# Altium PCB SBH_MCU.PcbDoc (part 1 of 2)
Units mm, origin at the board's own origin, x right, y up, seen from the top; angles counter-clockwise.
Board outline 53.97 x 54.34 mm, 4 copper layers (Top Layer, Mid Layer 1, Mid Layer 2, Bottom Layer), stack 1.57 mm thick; 82 components, 76 nets, 307 pads, 113 vias.
Unrouted connection lines stored in the file: 14.
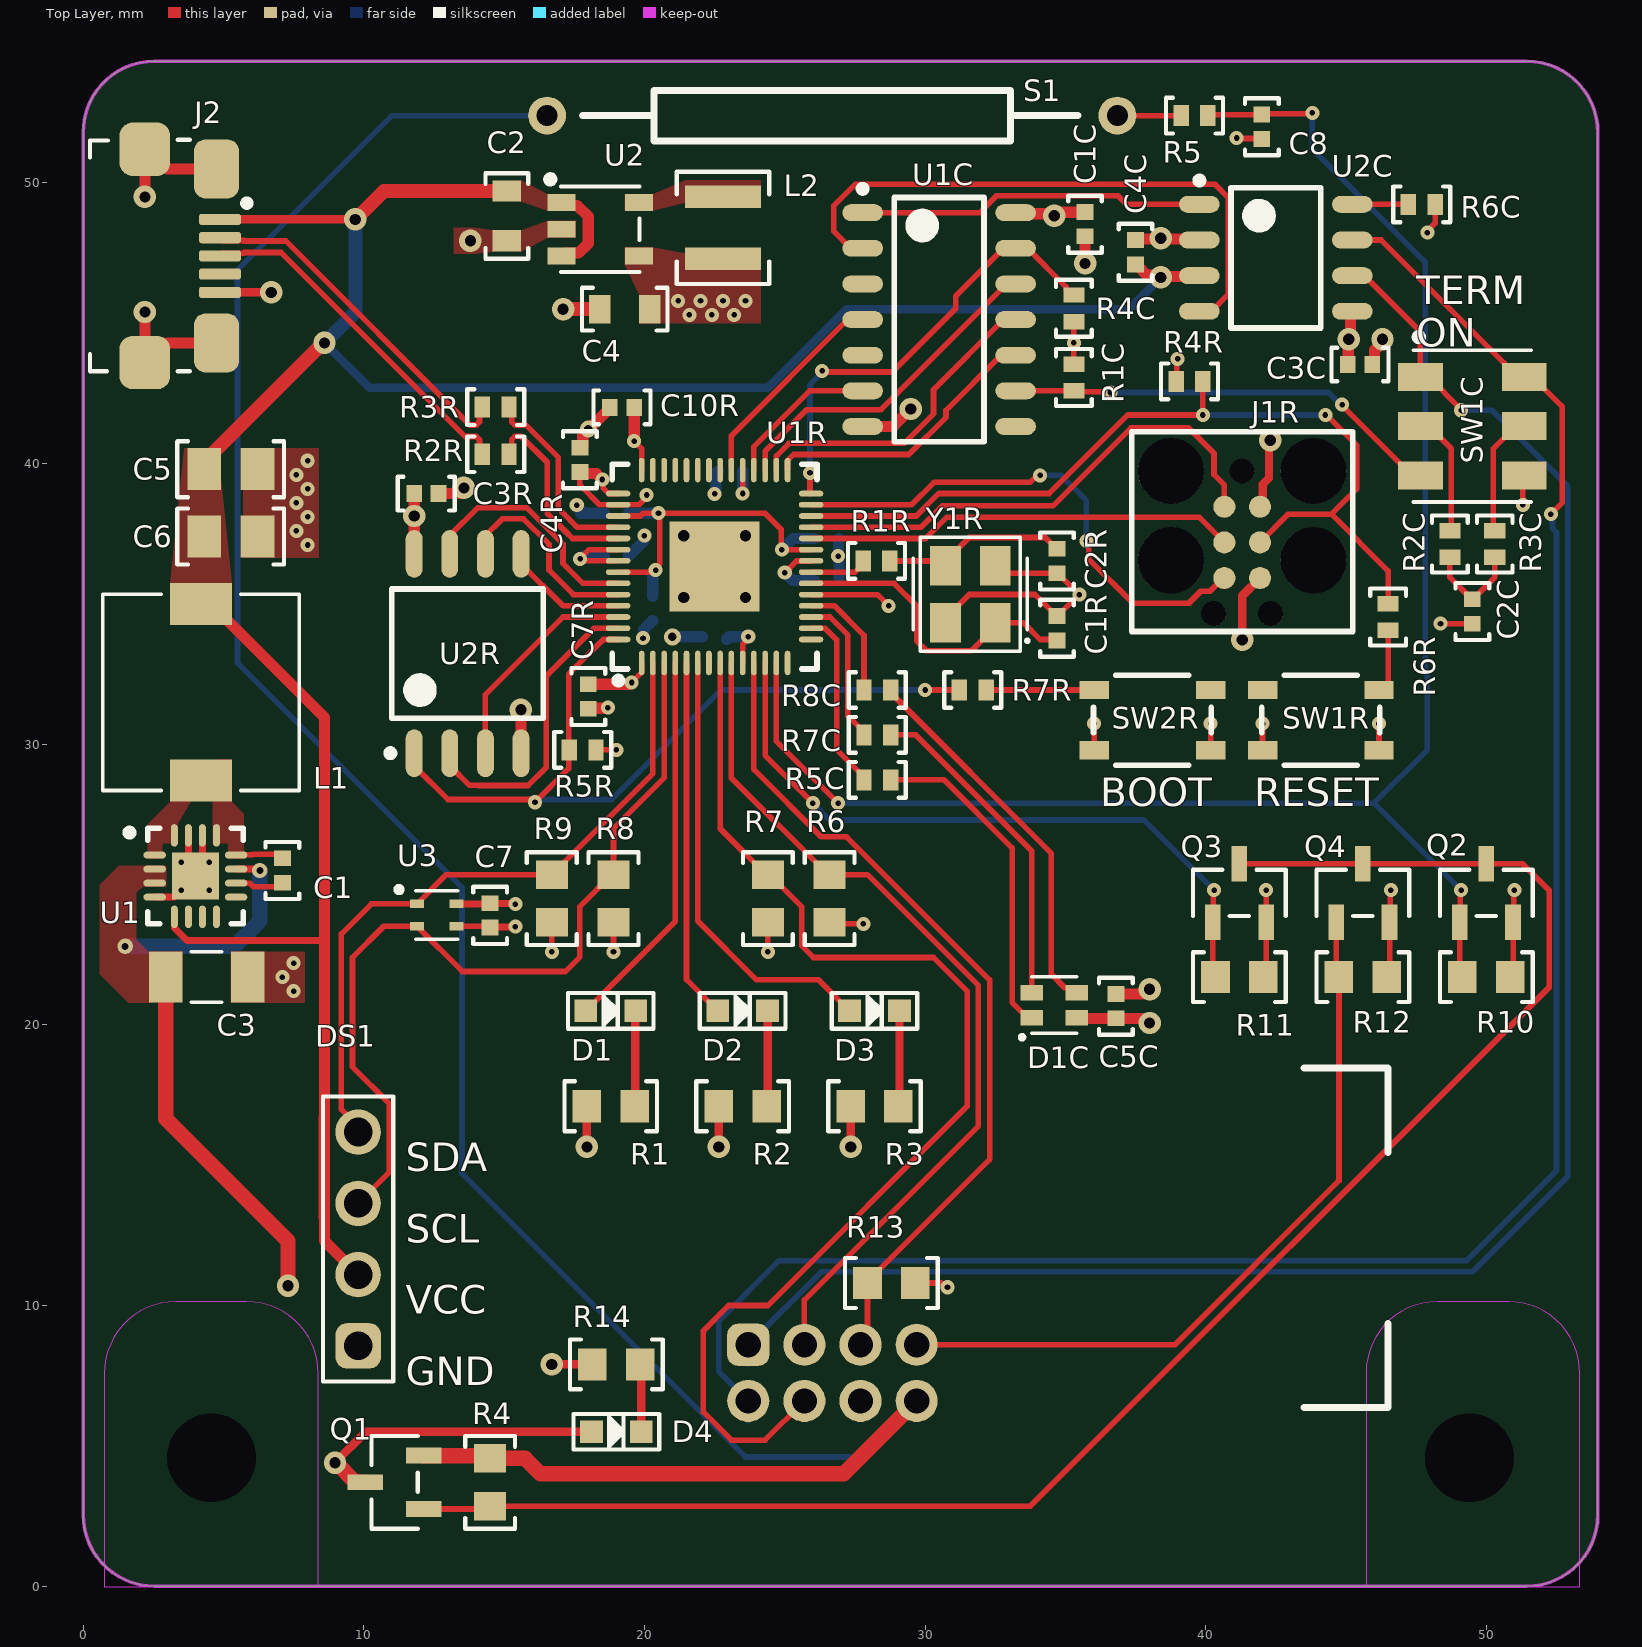
[diagram p0: Top Layer view]
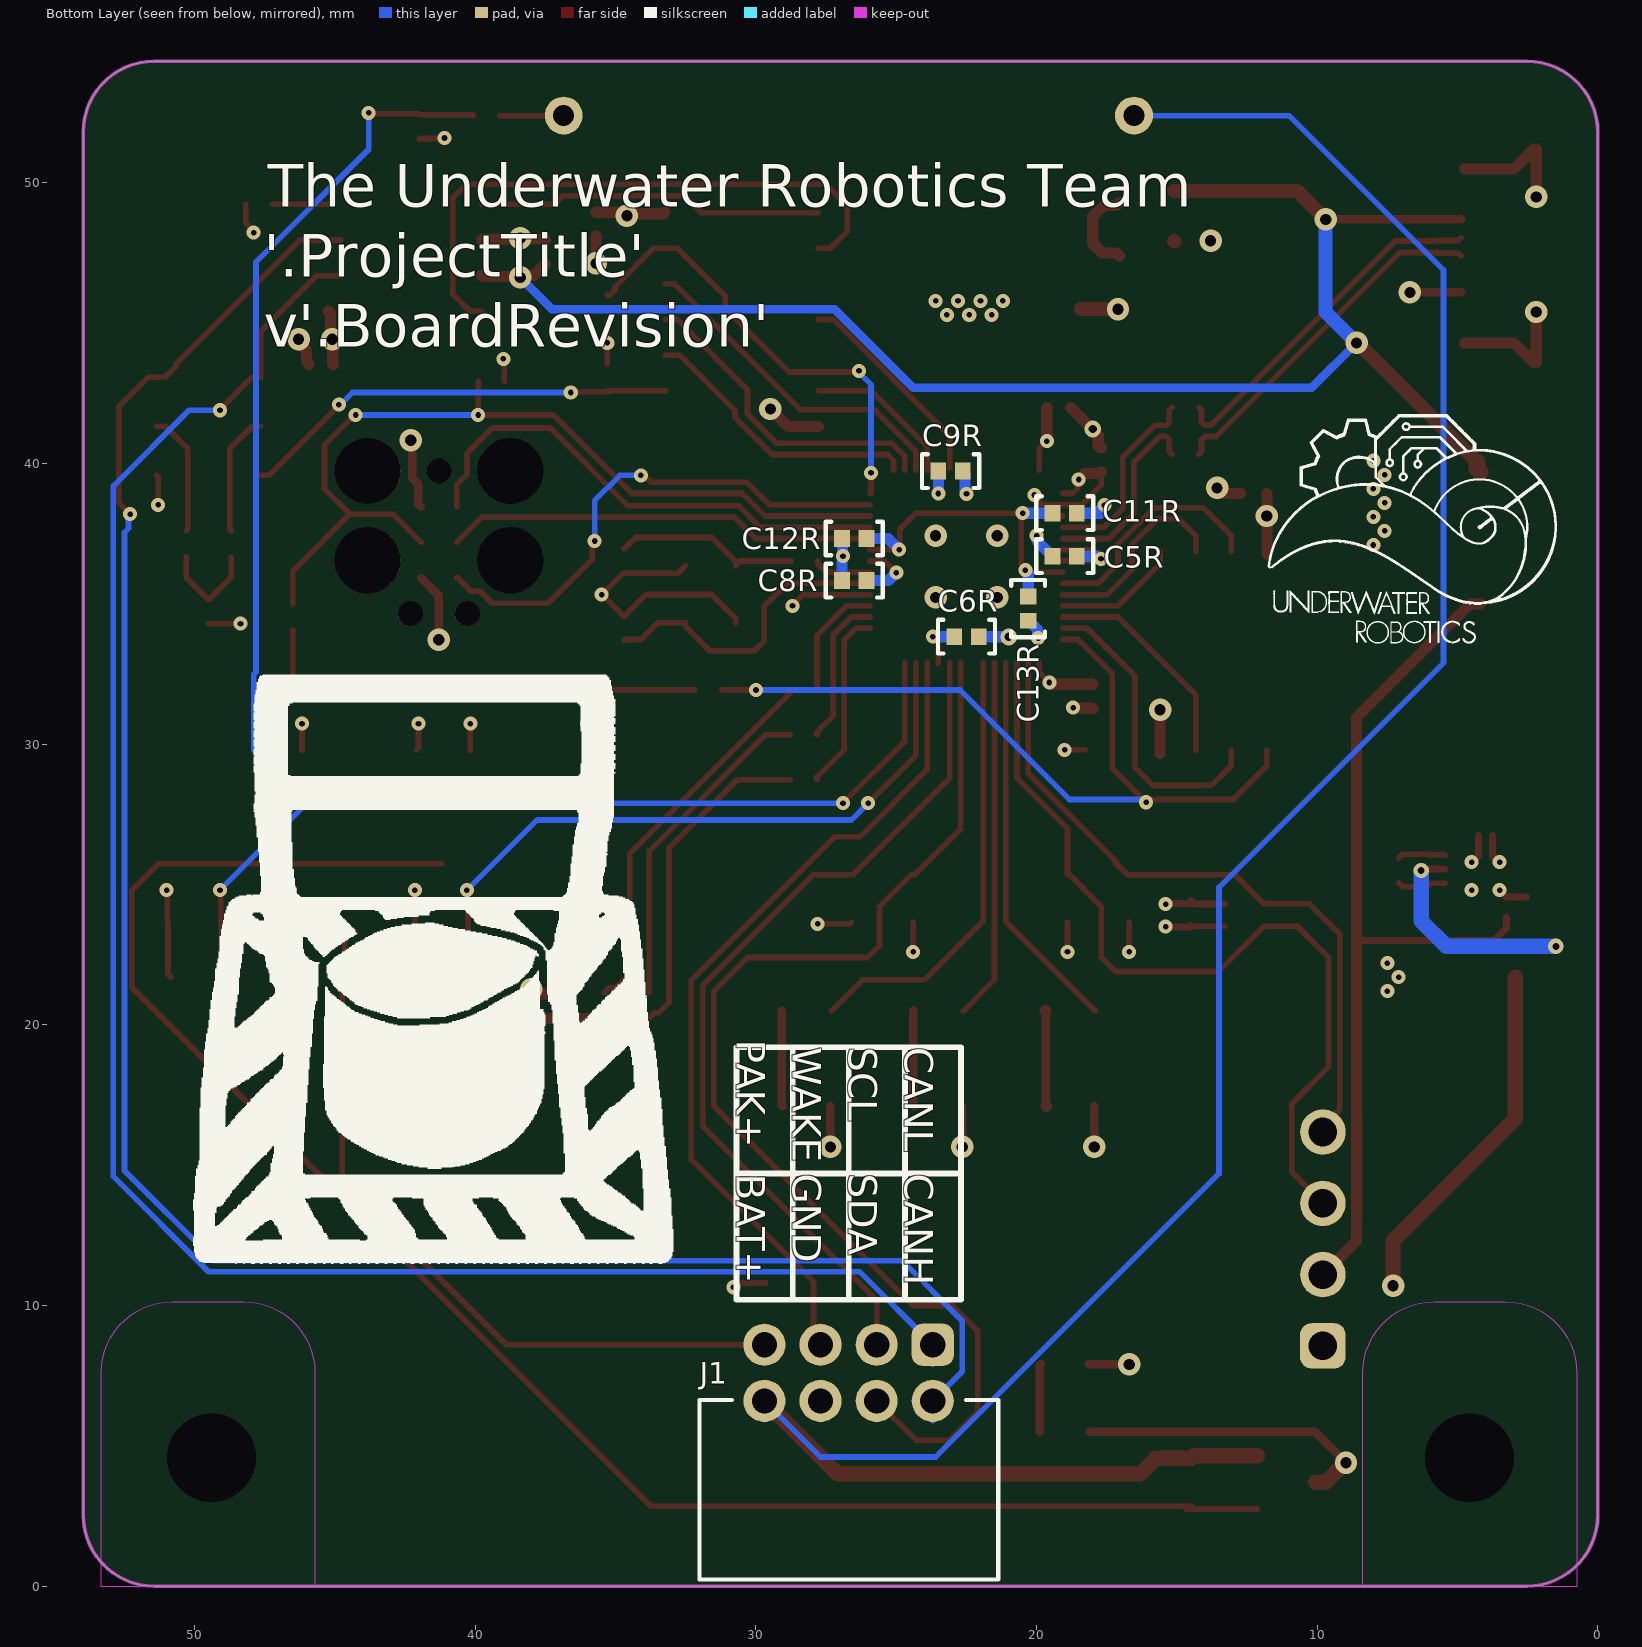
[diagram p1: Bottom Layer view, seen from below]
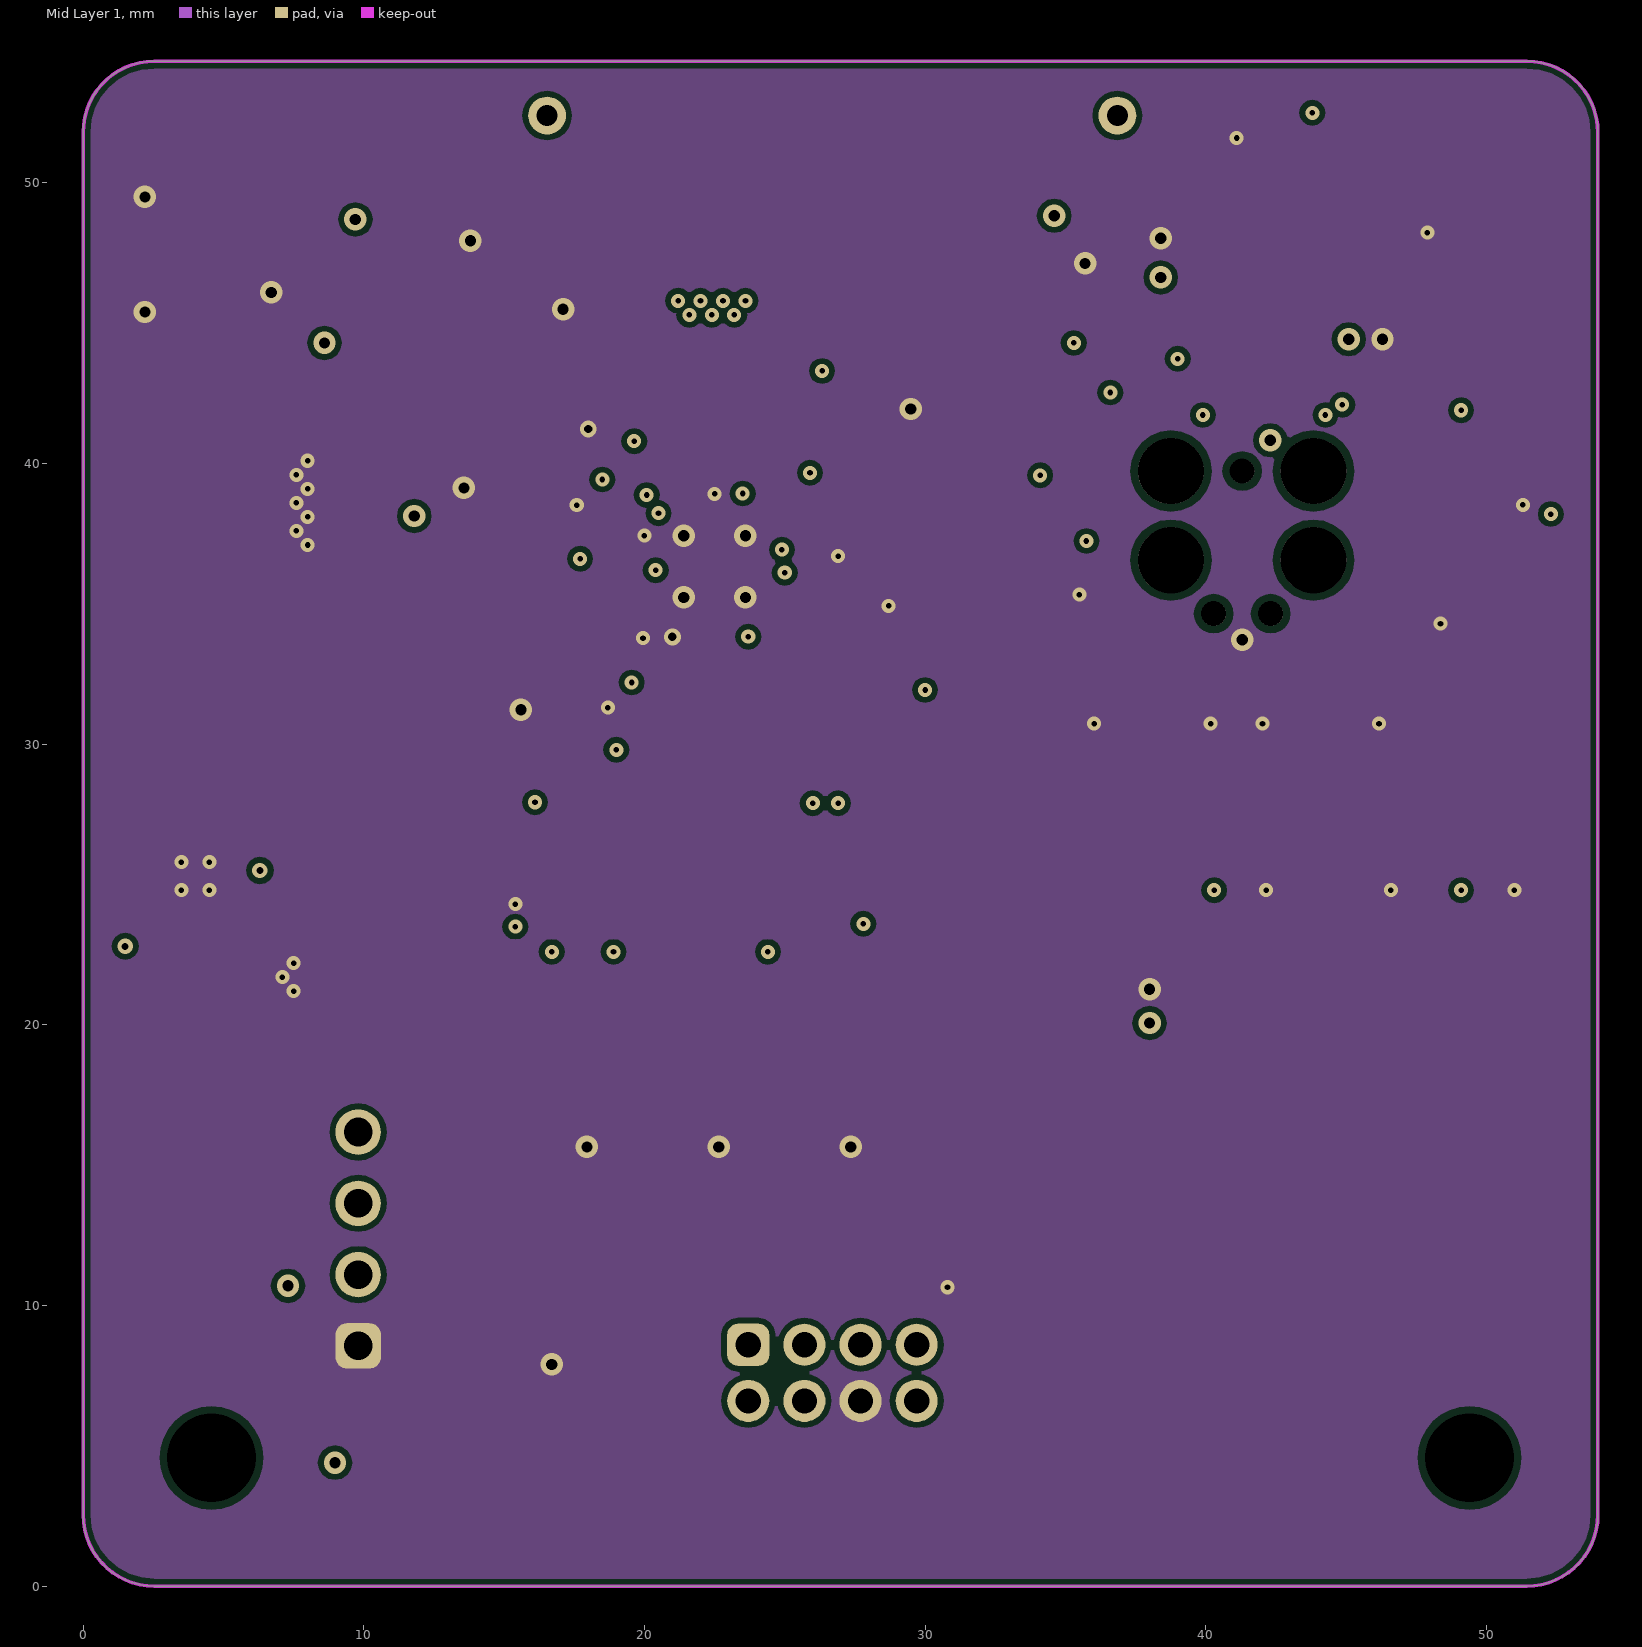
[diagram p2: Mid Layer 1]
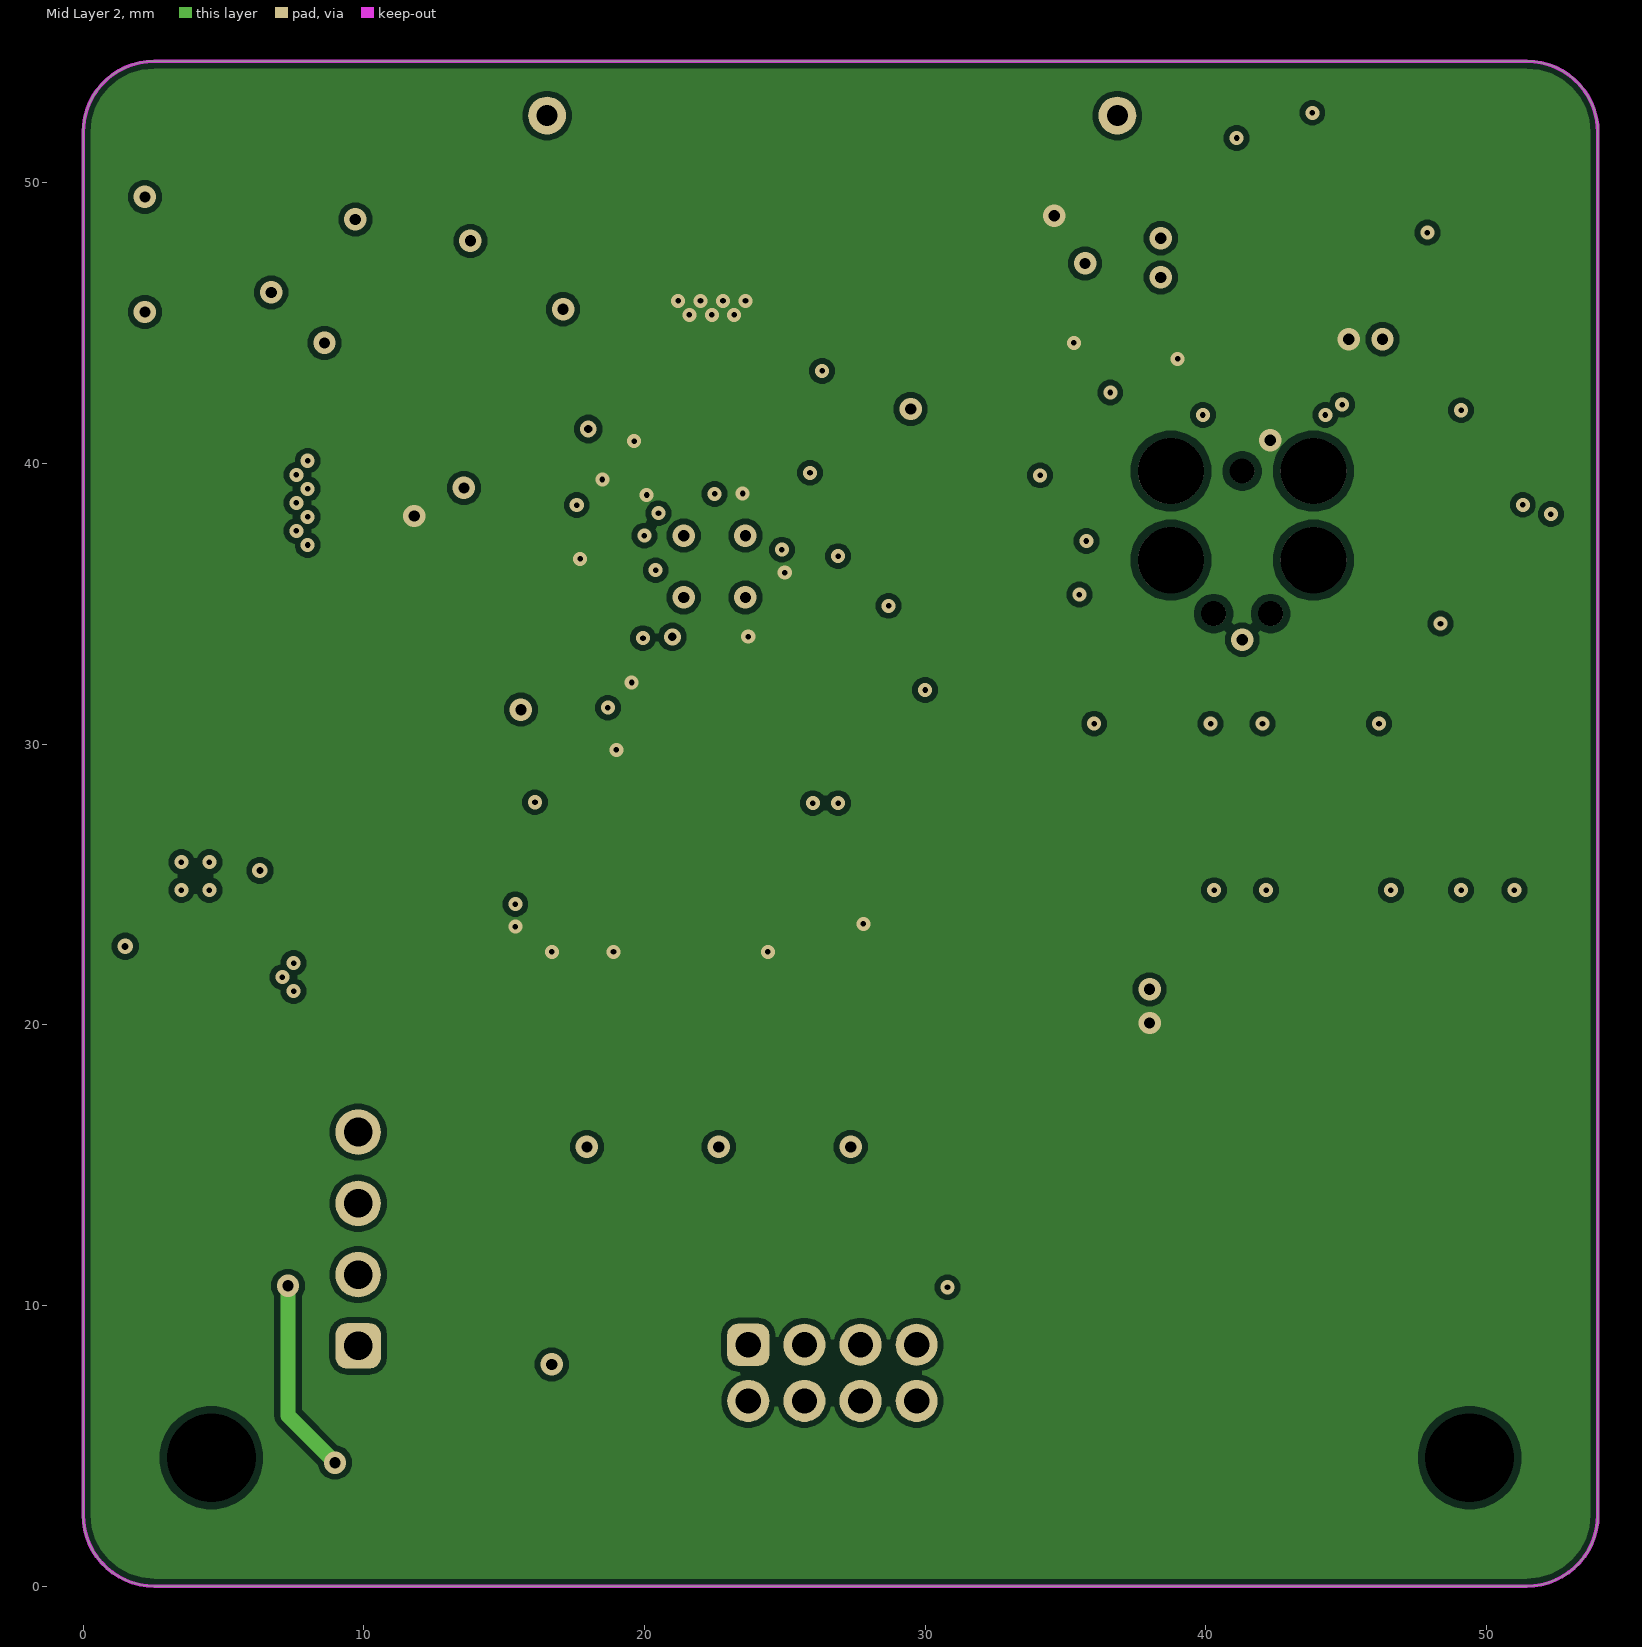
[diagram p3: Mid Layer 2]
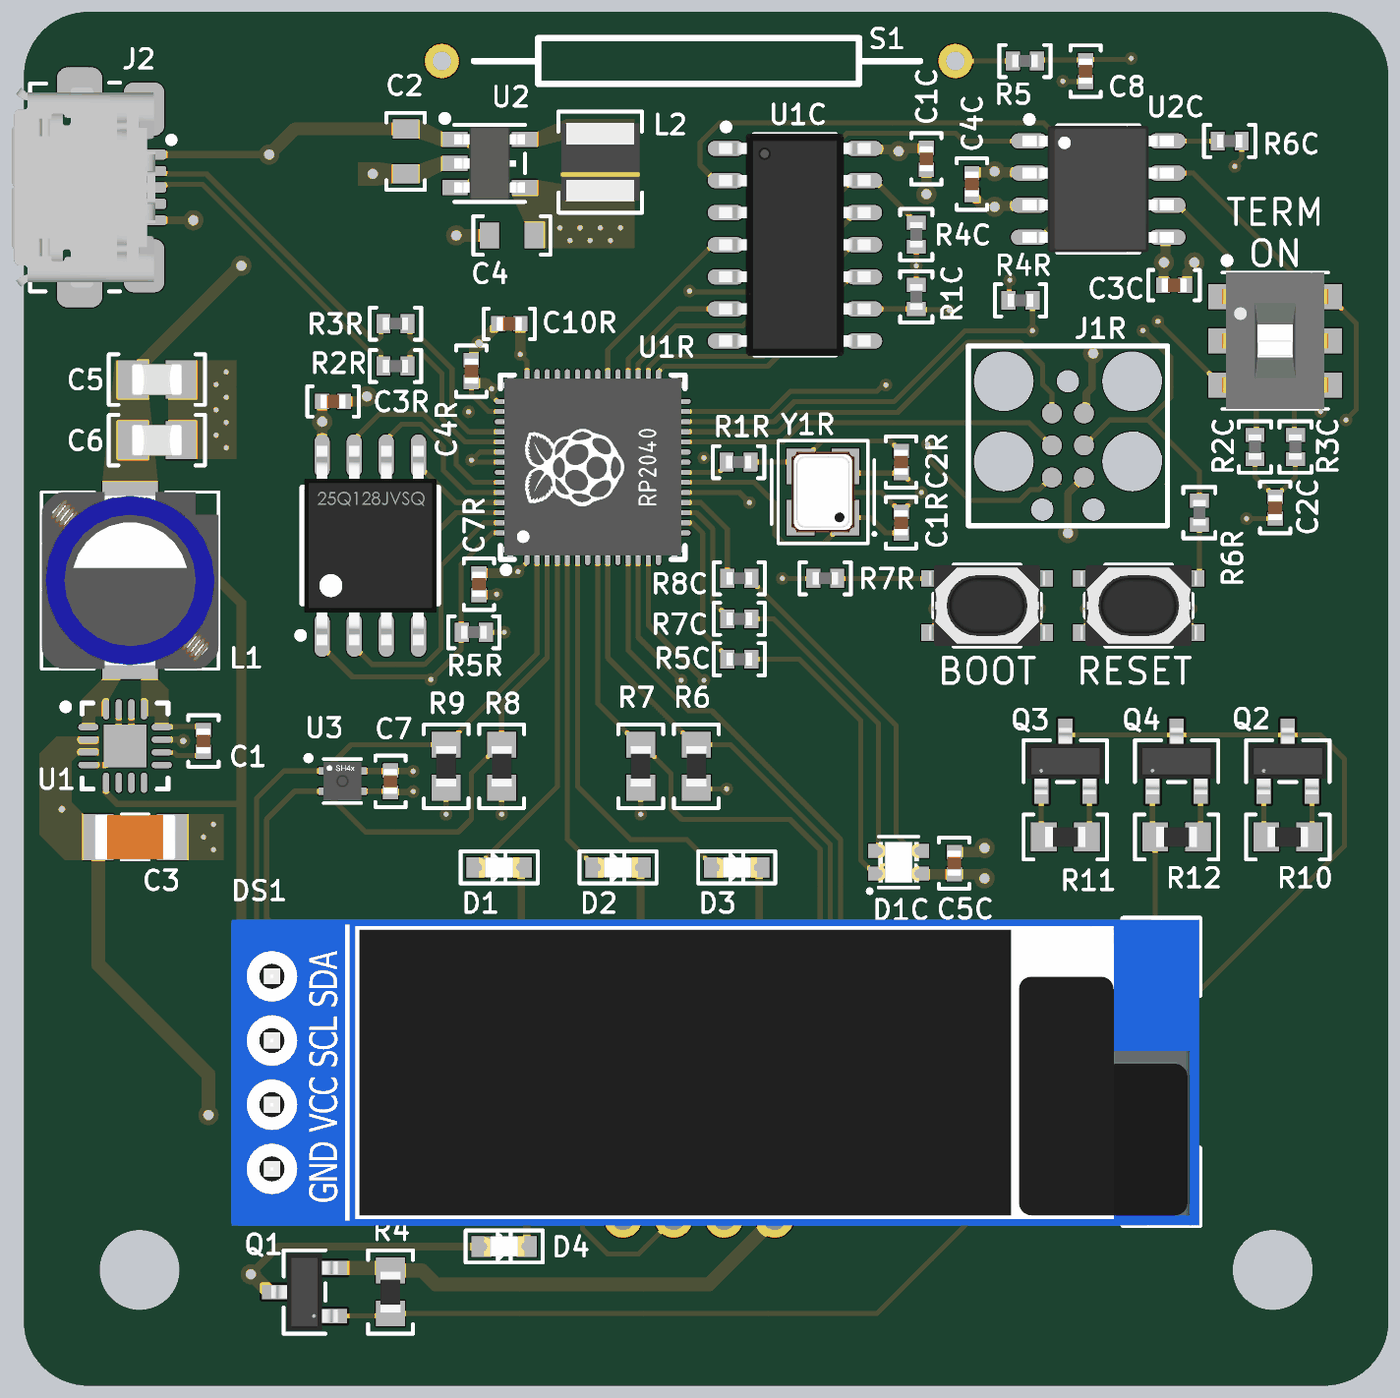
[diagram p4: 3D render of the assembled board from above, using the file's embedded part models]
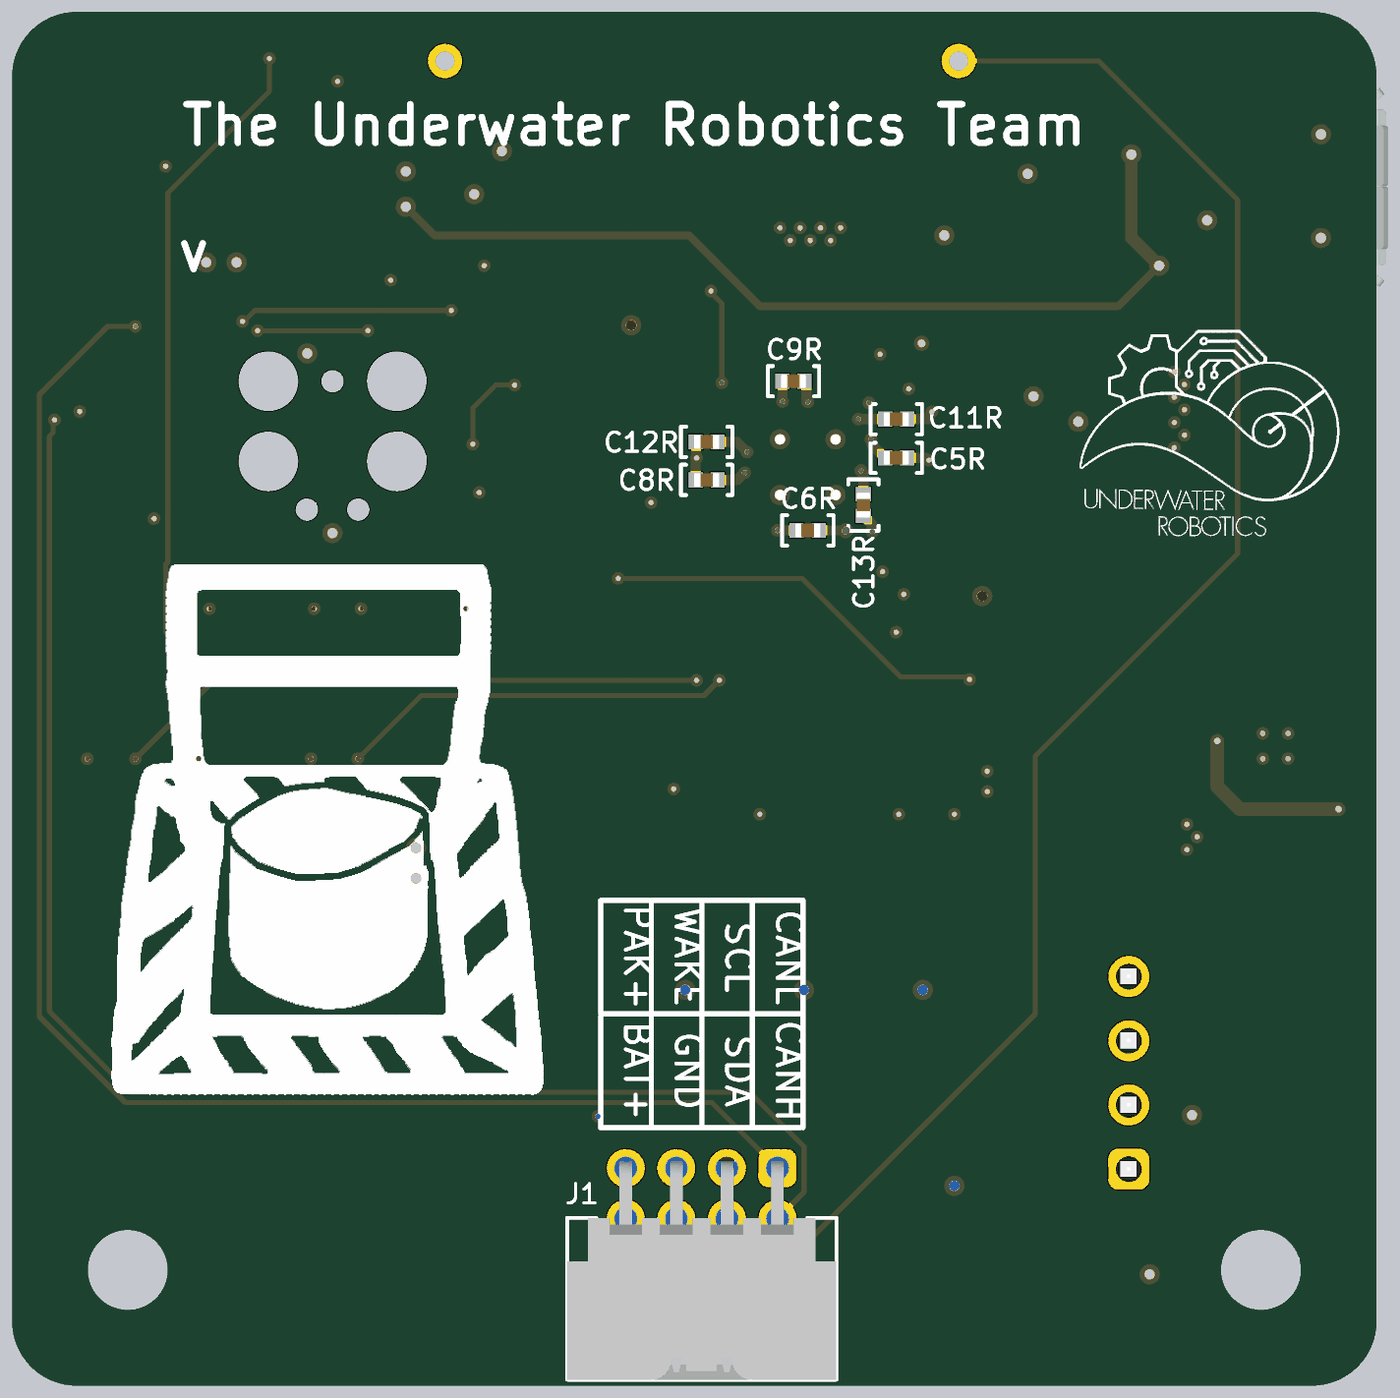
[diagram p5: 3D render of the assembled board from below, using the file's embedded part models]

## Layer stack, top to bottom
Top Solder: solder mask 0.0127, Solder Resist, Dk 3.8
Top Layer: signal copper 0.035
Dielectric 1: prepreg 0.2, 7628, Dk 4.6
Mid Layer 1: signal copper 0.0175
Core: core 1.065, FR-4, Dk 4.5
Mid Layer 2: signal copper 0.0175
Dielectric 2: prepreg 0.2, 7628, Dk 4.6
Bottom Layer: signal copper 0.035
Bottom Solder: solder mask 0.0127, Solder Resist, Dk 3.8

## Board outline
0,2.54 0,51.8 cw(c2.54,51.8) 2.54,54.34 51.435,54.34 cw(c51.435,51.8) 53.975,51.8 53.975,2.54 cw(c51.435,2.54) 51.435,0 2.54,0 cw(c2.54,2.54)

## Design rules (kind name [scope] priority, off if disabled: settings)
AcuteAngle [All] p1: minimum=6.00000000000000E+0001 checktracksonly=FALSE
BoardOutlineClearance "BoardOutlineClearance JLCPCB" [All] p1: gap=0.2 ignorepadtopadclearanceinfootprint=FALSE
Clearance "Clearance JLCPCB 4 layer" [All] p1: gap=0.2 ignorepadtopadclearanceinfootprint=FALSE except(0.09: Arc-Arc Arc-Track Track-Track; 0.127: Arc-SMDPad Track-SMDPad SMDPad-SMDPad; 0.254: Arc-Hole Track-Hole SMDPad-Hole THPad-Hole Via-Hole Fill-Hole Poly-Hole Region-Hole Text-Hole)
DiffPairsRouting [All] p1: maxlimit=0.254 minlimit=0.152 mostfreqgap=0.203 toplayer_minwidth=0.09 toplayer_maxwidth=0.381 toplayer_prefwidth=0.203 midlayer1_minwidth=0.09 midlayer1_maxwidth=0.381 midlayer1_prefwidth=0.203 midlayer2_minwidth=0.09 midlayer2_maxwidth=0.381 midlayer2_prefwidth=0.203 bottomlayer_minwidth=0.09 bottomlayer_maxwidth=0.381 bottomlayer_prefwidth=0.203 maxuncoupledlength=12.7
HoleSize "HoleSize JLCPCB Pad" [IsPad] p1: absolutevalues=TRUE maxlimit=6.3 minlimit=0.5 maxpercent=80.000 minpercent=20.000
HoleSize "HoleSize JLCPCB 4 layer" [All] p2: absolutevalues=TRUE maxlimit=6.3 minlimit=0.2 maxpercent=80.000 minpercent=20.000
HoleToHoleClearance "HoleToHoleClearance JLCPCB" [All] p1: gap=0.254 allowstackedmicrovias=TRUE
MinimumAnnularRing "MinimumAnnularRing JLCPCB Pad" [IsPad] p1: minimumring=0.3
MinimumAnnularRing "MinimumAnnularRing JLCPCB 1oz" [All] p2: minimumring=0.13
MinimumSolderMaskSliver [All] p1: minsoldermaskwidth=0.025
PlaneConnect [All] p1: pad.planeconnectstyle=Relief pad.reliefexpansion=0.508 pad.reliefentries=4 pad.reliefconductorwidth=0.254 pad.reliefairgap=0.254 via.planeconnectstyle=Direct via.reliefexpansion=0.508 via.reliefentries=4 via.reliefconductorwidth=0.254 via.reliefairgap=0.254
PolygonConnect [All] p1: connectstyle=Direct reliefconductorwidth=0.381 reliefentries=4 polygonreliefangle="45 Angle" airgapwidth=0.254
RoutingVias "RoutingVias JLCPCB 4 layer" [All] p1: holewidth=0.5 width=1 viastyle="Through Hole" minholewidth=0.2 minwidth=0.4 maxholewidth=1.27 maxwidth=2.032
SilkToSilkClearance [All] p1: silktosilkclearance=0.076
SilkToSolderMaskClearance "SilkToSolderMaskClearance JLCPCB" [IsPad] p1: minsilkscreentomaskgap=0.15 clearancetoexposedcopper=TRUE
SolderMaskExpansion "SolderMaskExpansion JLCPCB" [All] p1: expansion=0.05 istentingtop=FALSE
Width "Width JLCPCB 4 layer" [All] p1: maxlimit=5 minlimit=0.09 preferedwidth=0.25 minimp=50.000000 maximp=50.000000 favimp=50.000000
23 further rules are at their usual default settings.

## Classes and differential pairs
component class U_RP2040_C: C1R C2R C3R C4R C5R C6R C7R C8R C9R C10R C11R C12R C13R J1R R1R R2R R3R R4R R5R R6R R7R SW1R SW2R U1R U2R Y1R
component class U_RP2040_with_CAN: C1C C2C C3C C4C C5C D1C R1C R2C R3C R4C R5C R6C R7C R8C SW1C U1C U2C
component class SBH_MCU: C1 C2 C3 C4 C5 C6 C7 C8 D1 D2 D3 D4 DS1 J1 J2 L1 L2 Q1 Q2 Q3 Q4 R1 R2 R3 R4 R5 R6 R7 R8 R9 R10 R11 R12 R13 R14 S1 U1 U2 U3
differential pair class "USB 2.0": USB USB_RP2040
differential pair USB: +USB_P -USB_N
differential pair USB_RP2040: +USB_RP2040_P -USB_RP2040_N

## Components (designator, comment, footprint, x,y, rotation, side; value= is the part's Value field where it differs from the comment)
C1 "22nF Ceramic 25V" CAPACITOR_0402 7.1,25.5 r90 top value=22nF
C1C "100nF Ceramic 25V" CAPACITOR_0402 35.7,48.532 r270 top value=0.1uF
C1R "27pF Ceramic 50V" CAPACITOR_0402 34.7,34.132 r90 top value=27pF
C2 "4.7uF Ceramic 6.3V" CAPACITOR_0603 15.1,48.825 r270 top value=4.7uF
C2C "4700pF Ceramic 25V" CAPACITOR_0402 49.5,34.732 r90 top value=4.7nF
C2R "27pF Ceramic 50V" CAPACITOR_0402 34.7,36.532 r270 top value=27pF
C3 "10uF Ceramic 25V" CAPACITOR_1206 4.4,21.7 r0 top
C3C "100nF Ceramic 25V" CAPACITOR_0402 45.5,43.532 r0 top value=0.1uF
C3R "100nF Ceramic 6.3V" CAPACITOR_0402 12.23,38.932 r0 top value=0.1uF
C4 "10uF Ceramic 6.3V" CAPACITOR_0603 19.3,45.5 r180 top
C4C "100nF Ceramic 25V" CAPACITOR_0402 37.5,47.532 r90 top value=0.1uF
C4R "1uF Ceramic 16V" CAPACITOR_0402 17.7,40.132 r90 top value=1uF
C5 "22uF Ceramic 10V" CAPACITOR_0805 5.26,39.8 r0 top value=22uF
C5C "1uF Ceramic 16V" CAPACITOR_0402 36.8,20.665 r90 top value=1uF
C5R "100nF Ceramic 6.3V" CAPACITOR_0402 19,36.7 r0 bottom value=0.1uF
C6 "22uF Ceramic 10V" CAPACITOR_0805 5.26,37.4 r0 top value=22uF
C6R "100nF Ceramic 6.3V" CAPACITOR_0402 22.5,33.832 r180 bottom value=0.1uF
C7 "100nF Ceramic 25V" CAPACITOR_0402 14.5,23.9 r90 top value=0.1uF
C7R "100nF Ceramic 6.3V" CAPACITOR_0402 18,31.7 r270 top value=0.1uF
C8 "100nF Ceramic 25V" CAPACITOR_0402 42,52 r270 top value=0.1uF
C8R "100nF Ceramic 6.3V" CAPACITOR_0402 26.5,35.829 r0 bottom value=0.1uF
C9R "100nF Ceramic 6.3V" CAPACITOR_0402 23.065,39.732 r180 bottom value=0.1uF
C10R "100nF Ceramic 6.3V" CAPACITOR_0402 19.2,42 r180 top value=0.1uF
C11R "1uF Ceramic 16V" CAPACITOR_0402 19,38.232 r180 bottom value=1uF
C12R "100nF Ceramic 6.3V" CAPACITOR_0402 26.5,37.332 r0 bottom value=0.1uF
C13R "100nF Ceramic 6.3V" CAPACITOR_0402 20.3,34.832 r270 bottom value=0.1uF
D1 "150060RS75000" LED_0603 18.8,20.5 r0 top
D1C "EAST1616RGBB4" LED_0606_4SMD 34.6,20.7 r0 top
D2 "150060YS75000" LED_0603 23.5,20.5 r0 top
D3 "150060GS75000" LED_0603 28.2,20.5 r0 top
D4 "150060GS75000" LED_0603 19,5.5 r0 top
DS1 "DISP OLED 128x32" OLED_I2C_128x32 9.8,8.56 r0 top locked
J1 "Mini-Fit Jr R/A" Molex_Mili-Grid_2x4PIN_2.00MM_RA 26.7,7.6 r0 bottom
J1R "TagConnect SWD" TC2030-MCP 41.3,39.732 r270 top locked
J2 "USB_MICRO R/A" CONN_MINIUSB 2.2,47.4 r270 top
L1 "4.7uH Shielded Drum Core" INDUCTOR_SLF7045 4.2,31.85 r270 top value=4.7uH
L2 "1.5uH Shielded" INDUCTOR_NR3015 22.8,48.4 r90 top value=1.5uH
Q1 "DMP3056L-7" SOT-23-3 11.1,3.7 r90 top
Q2 "MOSFET N-CH 30V 5.8A SOT-23-3" SOT-23-3 50,24.7 r0 top
Q3 "MOSFET N-CH 30V 5.8A SOT-23-3" SOT-23-3 41.2,24.7 r0 top
Q4 "MOSFET N-CH 30V 5.8A SOT-23-3" SOT-23-3 45.6,24.7 r0 top
R1 "62 Ohm 1% 1/4W" RESISTOR_0603 18.8,17.1 r0 top
R1C "10k Ohm 1% 1/16W" RESISTOR_0402 35.3,43.067 r270 top
R1R "1k Ohm 1% 1/16W" RESISTOR_0402 28.273,36.532 r0 top
R2 "62 Ohm 1% 1/4W" RESISTOR_0603 23.5,17.1 r0 top
R2C "60.4 Ohm 1% 1/16W" RESISTOR_0402 48.7,37.132 r270 top
R2R "27 Ohm 1% 1/16W" RESISTOR_0402 14.7,40.332 r0 top
R3 "4.7 Ohm 5% 1/8W" RESISTOR_0603 28.2,17.1 r0 top
R3C "60.4 Ohm 1% 1/16W" RESISTOR_0402 50.3,37.132 r270 top
R3R "27 Ohm 1% 1/16W" RESISTOR_0402 14.7,42.008 r0 top
R4 "10k Ohm 5% 1/10W" RESISTOR_0603 14.5,3.7 r270 top
R4C "10k Ohm 1% 1/16W" RESISTOR_0402 35.3,45.532 r90 top
R4R "10k Ohm 1% 1/16W" RESISTOR_0402 39.425,42.932 r0 top
R5 "56k Ohm 1% 1/16W" RESISTOR_0402 39.6,52.4 r0 top
R5C "604 Ohm 1% 1/16W" RESISTOR_0402 28.3,28.732 r0 top
R5R "10k Ohm 1% 1/16W" RESISTOR_0402 17.8,29.8 r180 top
R6 "4.7k Ohm 5% 1/10W" RESISTOR_0603 26.6,24.5 r90 top
R6C "10k Ohm 1% 1/16W" RESISTOR_0402 47.7,49.237 r0 top
R6R "1k Ohm 1% 1/16W" RESISTOR_0402 46.5,34.532 r90 top
R7 "4.7k Ohm 5% 1/10W" RESISTOR_0603 24.4,24.5 r90 top
R7C "200 Ohm 1% 1/16W" RESISTOR_0402 28.3,30.332 r0 top
R7R "1k Ohm 1% 1/16W" RESISTOR_0402 31.7,31.932 r180 top
R8 "4.7k Ohm 5% 1/10W" RESISTOR_0603 18.9,24.5 r90 top
R8C "200 Ohm 1% 1/16W" RESISTOR_0402 28.3,31.932 r0 top
R9 "4.7k Ohm 5% 1/10W" RESISTOR_0603 16.7,24.5 r90 top
R10 "10k Ohm 5% 1/10W" RESISTOR_0603 50,21.7 r0 top
R11 "10k Ohm 5% 1/10W" RESISTOR_0603 41.2,21.7 r0 top
R12 "10k Ohm 5% 1/10W" RESISTOR_0603 45.6,21.7 r0 top
R13 "10k Ohm 5% 1/10W" RESISTOR_0603 28.8,10.8 r0 top
R14 "4.7k Ohm 5% 1/10W" RESISTOR_0603 19,7.9 r180 top
S1 "Reed Switch" MDSR-7 26.691,52.4 r180 top
SW1C "Switch DPDT" CAS-220TA 49.5,41.332 r270 top
SW1R "434123025826" SMD_434123025826 44.1,30.857 r0 top
SW2R "434123025826" SMD_434123025826 38.1,30.857 r0 top
U1 "REG BUCK 5V 1A" "QFN-16 (3x3)" 4,25.3 r0 top
U1C "MCP2517FD" SOIC-14 30.5,45.132 r0 top
U1R "RP2040" "QFN-56 RP2040" 22.5,36.332 r90 top locked
U2 "REG BUCK 3.3V 600mA" SOT-23-5 18.425,48.35 r0 top
U2C "CAN Transceiver" SOIC-8 42.5,47.332 r0 top
U2R "W25Q128JVSIQ" "SOIC-8 W25QxJV" 13.7,33.23 r90 top
U3 "SHT14 SENSOR HUMID/TEMP" XDCR_SHT41-AD1B-R2 12.6,23.913 r0 top
Y1R "CRYSTAL 12.0000MHZ 18PF SMD" "4-SMD, NO LEAD CRYSTAL 3.2x2.5mm" 32.5,34.332 r90 top

## Footprints (in the part's own frame and the unit in brackets; to place one, negate y for a bottom-side part, rotate by r counter-clockwise, add the part's x,y. Pads: shape width x height; smd on the part's side, far side on the other; paste and mask are expansions set on the pad)
"4-SMD, NO LEAD CRYSTAL 3.2x2.5mm" [mm]
  rrect0% 1.4x1.1 smd: 1(0,0) 2(2.032,0) 3(2.032,1.778) 4(0,1.778)
  silkscreen extent -1.02,-1.2 3.05,2.92, body extent -0.58,-0.36 2.62,2.14, height 0.82
CAPACITOR_0402 [mm]
  rect 0.56x0.6 smd: 1(-0.435,0) 2(0.435,0)
  silkscreen extent -1.02,-0.6 1.02,0.6, body extent -0.5,-0.28 0.5,0.27, height 0.51
CAPACITOR_0603 [mil] "CAPACITOR 0603"
  rect 30x40 smd: 1(-35,0) 2(35,0)
  silkscreen extent -60,-30 60,30, body extent -31,-16 32,16, height 31
CAPACITOR_0805 [mm] "CAPACITOR 0805"
  rect 1.2x1.5 smd: 1(-0.95,0) 2(0.95,0)
  silkscreen extent -1.9,-1 1.9,1, body extent -1,-0.62 1,0.63, height 1.26
CAPACITOR_1206 [mm]
  rect 1.2x1.82 smd: 1(-1.46,0) 2(1.46,0)
  silkscreen extent -0.54,-0.9 0.54,0.9, body extent -1.6,-0.9 1.6,0.9, height 1.61
CAS-220TA [mm] "SWITCH SLIDE DPDT 100MA 6V"
  rrect0% 1x1.6 smd: 1(-1.75,-1.85) 2(0,-1.85) 3(1.75,-1.85) 4(-1.75,1.85) 5(0,1.85) 6(1.75,1.85)
  silkscreen extent -3.3,-2.1 2.7,2.1, body extent -2.7,-2.1 2.7,2.1, height 2.51
CONN_MINIUSB [mm] "USB2.0 Micro-B Receptacle SMD R/A"
  rrect50% 0.4x1.5 smd: 1(-1.3,2.675) 2(-0.65,2.675) 3(0,2.675) 4(0.65,2.675) 5(1.3,2.675)
  rrect50% 2.1x1.6 smd: 6(-3.1,2.55) 7(3.1,2.55)
  rrect50% 1.9x1.8 smd: 8(3.8,0) 9(-3.8,0)
  silkscreen extent -4.14,-1.96 4.11,3.75, body extent -3.96,-2.67 3.96,2.99, height 2.72
INDUCTOR_NR3015 [mm] "NR3015 Series Inductor Footprint"
  rect 0.8x2.7 smd: 1(-1.1,0) 2(1.1,0)
  silkscreen extent -2,-1.65 2,1.65, body extent -1.55,-1.55 1.55,1.55, height 1.5
INDUCTOR_SLF7045 [mm]
  rect 1.5x2.2 smd: 1(-3.15,0) 2(3.15,0)
  silkscreen extent -3.5,-3.5 3.5,3.5, body extent -3.5,-3.5 3.5,3.5, height 4.8
LED_0603 [mil] "LED 0603"
  rect 32x32 smd: 1(-35,0) 2(35,0)
  silkscreen extent -60,-25 60,25, body extent -31,-16 32,16, height 28
LED_0606_4SMD [mm]
  rrect0% 0.8x0.55 smd: 1(-0.8,-0.45) 2(-0.8,0.45) 3(0.8,0.45) 4(0.8,-0.45)
  silkscreen extent -1.22,-1.22 0.8,1.02, body extent -0.8,-0.8 0.8,0.8, height 0.35
MDSR-7 [mm] "Littelfuse MDSR-7 12.7mm Sub-miniature Reed Switch"
  round 1.35 hole 0.75: 1(-10.16,0) 2(10.16,0)
  silkscreen extent -8.76,-0.9 8.89,0.9, body extent -10.4,-0.9 10.4,0.9, height 1.8
Molex_Mili-Grid_2x4PIN_2.00MM_RA [mm] "Molex Mili-Grid 2.00mm 2x4 RA"
  rrect50% 1.5x1.5 hole 0.9: 1(-3,-1)
  round 1.5 hole 0.9: 2(-3,1) 3(-1,-1) 4(-1,1) 5(1,-1) 6(1,1) 7(3,-1) 8(3,1)
  silkscreen extent -5.33,0.97 5.32,7.37, body extent -5.32,-1.27 5.33,7.38, height 6.31
OLED_I2C_128x32 [mm]
  rrect50% 1.62x1.62 hole 1.02: 1(0,0)
  round 1.62 hole 1.02: 2(0,2.54) 3(0,5.08) 4(0,7.62)
  silkscreen extent -1.25,-2.2 36.7,9.9, body extent -1.59,-2.23 36.71,9.87, height 5.12
"QFN-16 (3x3)" [mm] "QFN, 16-Leads, Body 3.00x3.00mm, Pitch 0.50mm, Thermal Pad 1.68x1.68mm, IPC Medium Density"
  oval 0.8x0.25 smd: 1(-1.45,0.75) 2(-1.45,0.25) 3(-1.45,-0.25) 4(-1.45,-0.75) 9(1.45,-0.75) 10(1.45,-0.25) 11(1.45,0.25) 12(1.45,0.75)
  oval 0.25x0.8 smd: 5(-0.75,-1.45) 6(-0.25,-1.45) 7(0.25,-1.45) 8(0.75,-1.45) 13(0.75,1.45) 14(0.25,1.45) 15(-0.25,1.45) 16(-0.75,1.45)
  rect 1.68x1.68 smd: 17(0,0)
  silkscreen extent -2.47,-1.7 1.7,1.7, body extent -1.55,-1.55 1.55,1.55, height 1
"QFN-56 RP2040" [mm] "QFN, 56-Leads, Body 7.00x7.00mm, Pitch 0.40mm, Thermal Pad 3.10x3.10mm, IPC Medium Density"
  oval 0.875x0.2 smd: 1(-3.437,2.6) 2(-3.437,2.2) 3(-3.437,1.8) 4(-3.437,1.4) 5(-3.437,1) 6(-3.437,0.6) 7(-3.437,0.2) 8(-3.437,-0.2) 9(-3.437,-0.6) 10(-3.437,-1) 11(-3.437,-1.4) 12(-3.437,-1.8) 13(-3.437,-2.2) 14(-3.437,-2.6) 29(3.437,-2.6) 30(3.437,-2.2) 31(3.437,-1.8) 32(3.437,-1.4) 33(3.437,-1) 34(3.437,-0.6) 35(3.437,-0.2) 36(3.437,0.2) 37(3.437,0.6) 38(3.437,1) 39(3.437,1.4) 40(3.437,1.8) 41(3.437,2.2) 42(3.437,2.6)
  oval 0.2x0.875 smd: 15(-2.6,-3.437) 16(-2.2,-3.437) 17(-1.8,-3.437) 18(-1.4,-3.437) 19(-1,-3.437) 20(-0.6,-3.437) 21(-0.2,-3.437) 22(0.2,-3.437) 23(0.6,-3.437) 24(1,-3.437) 25(1.4,-3.437) 26(1.8,-3.437) 27(2.2,-3.437) 28(2.6,-3.437) 43(2.6,3.437) 44(2.2,3.437) 45(1.8,3.437) 46(1.4,3.437) 47(1,3.437) 48(0.6,3.437) 49(0.2,3.437) 50(-0.2,3.437) 51(-0.6,3.437) 52(-1,3.437) 53(-1.4,3.437) 54(-1.8,3.437) 55(-2.2,3.437) 56(-2.6,3.437)
  rect 3.2x3.2 smd: 57(0,0)
  silkscreen extent -4.19,-3.65 3.65,3.65, body extent -3.52,-3.52 3.52,3.52, height 0.85
RESISTOR_0402 [mm] "Resistor 0402"
  rect 0.55x0.75 smd: 1(-0.475,0) 2(0.475,0)
  silkscreen extent -1.02,-0.64 1.02,0.64, body extent -0.5,-0.25 0.5,0.25, height 0.25
RESISTOR_0603 [mil] "Resistor 0603"
  rect 40x45 smd: 1(-33.5,0) 2(33.5,0)
  silkscreen extent -65,-35 65,35, body extent -31,-16 32,16, height 16
SMD_434123025826 [mm]
  rect 1.05x0.65 smd: A1(-2.075,1.075) A2(2.075,1.075) B1(-2.075,-1.075) B2(2.075,-1.075)
  silkscreen extent -2.1,-1.6 2.1,1.6, body extent -2.3,-1.6 2.3,1.6, height 2.5
SOIC-8 [mm] "SOIC, 8-Leads, Body 4.90x3.90mm, Pitch 1.27mm, IPC Medium Density"
  oval 1.45x0.6 smd: 1(-2.725,1.905) 2(-2.725,0.635) 3(-2.725,-0.635) 4(-2.725,-1.905) 5(2.725,-1.905) 6(2.725,-0.635) 7(2.725,0.635) 8(2.725,1.905)
  silkscreen extent -2.85,-2.5 1.6,2.88, body extent -3,-2.5 3,2.5, height 1.75
"SOIC-8 W25QxJV" [mm] "SOIC, 8-Leads, Body 5.28x5.28mm, Pitch 1.27mm, IPC Medium Density"
  oval 1.7x0.6 smd: 1(-3.55,1.905) 2(-3.55,0.635) 3(-3.55,-0.635) 4(-3.55,-1.905) 5(3.55,-1.905) 6(3.55,-0.635) 7(3.55,0.635) 8(3.55,1.905)
  silkscreen extent -3.67,-2.7 2.3,2.88, body extent -3.95,-2.62 3.95,2.62, height 1.95
SOIC-14 [mm] "SOIC, 14-Leads, Body 8.65x3.90mm, Pitch 1.27mm, IPC Medium Density"
  oval 1.45x0.6 smd: 1(-2.725,3.81) 2(-2.725,2.54) 3(-2.725,1.27) 4(-2.725,0) 5(-2.725,-1.27) 6(-2.725,-2.54) 7(-2.725,-3.81) 8(2.725,-3.81) 9(2.725,-2.54) 10(2.725,-1.27) 11(2.725,0) 12(2.725,1.27) 13(2.725,2.54) 14(2.725,3.81)
  silkscreen extent -2.85,-4.35 1.6,4.78, body extent -3,-4.4 3,4.4, height 1.7
SOT-23-3 [mil]
  rect 22x50 smd paste+0 mask+4: 1(-37.5,-41) 2(37.5,-41) 3(0,41)
  silkscreen extent -65,-33 65,33, body extent -60,-52 60,52, height 44
SOT-23-5 [mm]
  rect 1x0.6 smd paste+0: 1(-1.375,0.95) 2(-1.375,0) 3(-1.375,-0.95) 4(1.375,-0.95) 5(1.375,0.95)
  silkscreen extent -1.9,-1.52 1.4,1.9, body extent -1.4,-1.45 1.4,1.45, height 1.2
TC2030-MCP [mil]
  round 31 smd: 1(50,-25) 2(50,25) 3(100,-25) 4(100,25) 5(150,-25) 6(150,25)
  round 34 hole 35 unplated: A(0,0) B(200,40) C(200,-40)
  round 92 hole 93 unplated: D(0,-100) E(125,-100) F(0,100) G(125,100)
  silkscreen extent -55,-155 225,155
XDCR_SHT41-AD1B-R2 [mm] "Sensirion AG SHT14 Sensor Humidity/Temp"
  rect 0.5x0.3 smd: 1(-0.7,0.4) 2(-0.7,-0.4) 3(0.7,-0.4) 4(0.7,0.4)
  silkscreen extent -1.45,-0.87 0.75,1.01, body extent -0.75,-0.75 0.75,0.75, height 0.54

## Part data
C1: library part CAPACITOR_0.022uF_0402, "Cap 22nF 25V +/-10% / Ceramic 0402", Supplier Part Number 1=445-1261-1-ND, Tolerance="+/- 10%", Voltage=25V, Made By="Robert Pafford", Supplier 1=Digi-Key
C1C C3C C3R C4C C5R C6R C7 C7R C8 C8R C9R C10R C12R C13R: library part CAPACITOR_0.1uF_0402, "Cap 100nF 25V +/-10% / Ceramic 0402", Supplier Part Number 1=478-7868-1-ND, Tolerance="+/- 10%", Voltage=25V, Made By="Robert Pafford", Supplier 1=Digi-Key
C1R C2R: library part CAPACITOR_0.000027uF_0402, "Cap 27pF 50V +/-5% / Ceramic 0402", Supplier Part Number 1=445-5589-1-ND, Tolerance="+/- 5%", Voltage=50V, Made By="Robert Pafford", Supplier 1=Digi-Key
C2: library part CAPACITOR_4.7uF_0603, "Cap 4.7uF 6.3V +/-10% / Ceramic 0603", Supplier Part Number 1=1276-2087-1-ND, Tolerance="+/- 10%", Voltage=6.3V, Made By="Robert Pafford", Supplier 1=Digi-Key
C2C: library part CAPACITOR_0.0047uF_0402, "4700 pF +/-10% 25V Ceramic Capacitor X7R 0402", Supplier Part Number 1=478-6195-1-ND, Tolerance="+/- 10%", Voltage=25V, Made By="Robert Pafford", Supplier 1=Digi-Key
C3: library part CAPACITOR_10uF_1206, "Cap 10uF 25V +/-10% / Ceramic 1206", Supplier Part Number 1=1276-1804-6-ND, Tolerance="+/- 10%", Value (uF)="10 uF", Voltage=25V, Made By="Robert Pafford", Supplier 1=Digi-Key
C4: library part CAPACITOR_10uF_0603, "Cap 10uF 6.3V +/-20% / Ceramic 0603", Supplier Part Number 1=1276-1119-1-ND, Tolerance="+/- 20%", Value (uF)="10 uF", Voltage=6.3V, ComponentLink1Description=Digikey, ComponentLink1URL=https://www.digikey.com/en/products/detail/samsung-electro-mechanics/CL10A106MQ8NNNC/3886777, Made By="Flip B", Supplier 1=Digi-Key
C4R C5C C11R: library part CAPACITOR_1uF_0402, "Cap 1uF 16V +/-10% / Ceramic 0402", Supplier Part Number 1=478-0402YD105KAT4ADKR-ND, Tolerance="+/- 10%", Voltage=16V, Made By="Robert Pafford", Supplier 1=Digi-Key
C5 C6: library part CAPACITOR_22uF_0805, "Cap 22uF 10V +/-20% X5R / Ceramic 0805", Supplier Part Number 1=445-7665-6-ND, Tolerance="+/- 20%", Voltage=10V, Made By="Robert Pafford", Supplier 1=Digi-Key
D1: library part LED_Red_0603, "LED Red Vf= 2V If = 0.020A / 150060RS75000", Color=Red, Forward Current=20mA, Forward Voltage=2V, Package=0603, Supplier Part Number 1=732-4978-1-ND, Made By="Robert Pafford", Supplier 1=Digi-Key
D1C: library part LED_RGB_4SMD, "LED RGB CLEAR 4SMD", Blue Forward Current=5mA, Blue Forward Voltage=2.8V, Color=RGB, Package=4-SMD, Red Forward Voltage=1.8V, Supplier Part Number 1=1080-1552-1-ND, ComponentLink1Description=Datasheet, ComponentLink1URL=https://everlightamericas.com/index.php?controller=attachment&id_attachment=3220, Green Forward Current=5mA, Green Forward Voltage=2.8V, Made By="Robert Pafford", Red Forward Current=5mA, Supplier 1=Digi-Key
D2: library part LED_Yellow_0603, "LED Yellow Vf= 2V If = 0.020A / 150060YS75000", Color=Yellow, Forward Current=20mA, Forward Voltage=2V, Package=0603, Supplier Part Number 1=732-4981-1-ND, Made By="Robert Pafford", Supplier 1=Digi-Key
D3 D4: library part LED_Green_0603_3.2V, "LED Green Vf= 3.2V If = 0.025A / 150060GS75000", Color=Green, Forward Current=25mA, Forward Voltage=3.2V, Package=0603, Supplier Part Number 1=732-4971-1-ND, ComponentLink1Description=Datasheet, ComponentLink1URL=https://www.we-online.de/katalog/datasheet/150060GS75000.pdf, Made By="Flip B", Supplier 1=Digi-Key
DS1: library part OLED_I2C_128x32, "0.91'' 128x32 I2C OLED LCD Display Module", Input Voltage="3.3V, 5V", Display Size=128x32, Made By="Robert Pafford", Protocol=I2C
J1: library part CONN_MOLEX_MiliGrid_8POS_R/A, "Molex Mili-Grid 2.00mm pitch 8 Pos Right Angle", Color=Black, Current Per Pin=1A, Manufacturer=Molex, Supplier Part Number 1=WM23634-ND, ComponentLink1Description=Datasheet, ComponentLink1URL=https://www.molex.com/pdm_docs/sd/878330821_sd.pdf, Configuration="Right Angle", Created By="Flip B", Number of Positions=8, Pitch=2.00mm, Series=Mili-Grid, Supplier 1=Digi-Key
J1R: library part TC2030_SWD, "TagConnect TC2030 ARM SWD 6-pin"
J2: library part CONN_MICROUSB, "Amphenol Micro USB-B / USB2.0 5 Pin Right Angle SMD", Color=Silver, Current Per Pin=1.8A, Manufacturer=Amphenol, Supplier Part Number 1=609-4613-1-ND, ComponentLink1Description=Datasheet, ComponentLink1URL=https://cdn.amphenol-icc.com/media/wysiwyg/files/documentation/datasheet/inputoutput/io_usb_micro.pdf?__cf_chl_jschl_tk__=05693735e19256298f6ef6ca2bb2e65c376a4f56-1625503833-0-Abitsb0-ufjOXJYs_S3J3r2iTn-nObalbmXUksF1VvO_h_WEmRdMlUD1I8-hmWSEVWzY1pirKnrPZWfgY3851qyBZe5ZvnNQePLGIzUgdEIQBVUyW36RsbYpDLEWxJ4horD-5gChFgobLYqwmG5aHl0E8lIn_twwPPrOxilK2gP0q9t_CNOs_u5fMqXvXUrlsOv8tIE2NRlu6NVP8qtkL2GjhlkeTUbDMF8WvvpPDTFOgvZ4Y16Ej8F8AhWos88mo5B1HssXozw0XrkJQIqERITUu6rqloz9kf4ZzhBHtDAt-IkiAFY_Ds9SW8FYKKTtINJVpHZQ6Gyu1FFM4Dc9MO0maE8_mmNcwlxqyRoRk_MPWW8VyByXWM5RSp52jteRKw7FeI9WIYvCbPAOy0Eyib-aseIQsnGbglBcUY6_2xp8GYaJM38H3dNvBPsSOfJBPndKedwKHllxjkucXn6xsN0sDXkpGN-cu8_2bDTJ0g-uUucKSCooYX-ApSDNGpkA_p9zv1SOAD8c0zaZVmtiBsN75QpVz2rzq9_BFxOywPvR, Configuration="Right Angle", Created By="Flip B", Number of Positions=5, Pitch=0.65mm, Series=10118192, Supplier 1=Digi-Key
L1: library part INDUCTOR_4.7uH_SLF7045T, "4.7 µH Shielded Drum Core, Wirewound Inductor 2.1 A 36mOhm Max Nonstandard", Current Rating=2.1A, DC Resistance=36mOhm, Supplier Part Number 1=587-2617-1-ND, Tolerance="+/- 20%", Made By="Robert Pafford", Supplier 1=Digi-Key
L2: library part INDUCTOR_1.5uH_NR3015, "Inductor Shielded 1.5uH 1.8A +/-30%", Current Rating=1.8A, DC Resistance=48mOhm, Supplier Part Number 1=587-2617-1-ND, Tolerance="+/- 30%", Made By="Robert Pafford", Supplier 1=Digi-Key
Q1: "P-Channel 30V 4.3A (Ta) 1.38W (Ta) Surface Mount SOT23", Supplier Part Number 1=DMP3056L-7DICT-ND, Created By="John Ulm", Id=-4.3A, Reviewed By=---, Supplier 1=Digi-Key, VDSS (Max)=-30V, Vgss (Max)=+-25V
Q2 Q3 Q4: library part AO3404A, "N-Channel 30 V 5.8A (Ta) 1.4W (Ta) Surface Mount SOT-23-3", Amp Rating="5.8 A", Package=SOT23-3L, Power Dissipation="1.4W (Ta)", Supplier Part Number 1=785-1004-1-ND, Created By="Dylan T", FET Type=N-Channel, Manufacturer _Part_Number=AO3404A, Rds (on)="28mOhm @ 5.8A, 10V", SourceLibrary=ON_Semiconductor_2020-01-13, Supplier 1=Digi-Key, Vdss=30V, Vendor="Alpha & Omega Semiconductor Inc.", Vgs (Max)="3V @ 5.8A, 10V", Vgs (th)="3V @ 250µA"
R1 R2: library part RESISTOR_62_0603, "RES SMD 62 OHM 1% 1/4W 0603", Digikey Part Numer=CR0603-JW-104ELFTR-ND, Supplier Part Number 1=541-RCS060362R0FKEACT-ND, Tolerance="+/- 1%", Value  (Ohms)=62, ComponentLink1Description=Datasheet, ComponentLink1URL=https://www.bourns.com/docs/product-datasheets/CRxxxxx.pdf, Made By="Robert Pafford", Supplier=Digikey, Supplier 1=Digi-Key, Wattage=1/4W
R1C R4C R4R R5R R6C: library part RESISTOR_10K_0402, "RES 10k OHM 1% 1/16W 0402", Digikey Part Numer=CR0603-JW-104ELFTR-ND, Supplier Part Number 1=YAG3436CT-ND, Tolerance="+/- 1%", Value  (Ohms)=10K, Made By="Robert Pafford", Supplier=Digikey, Supplier 1=Digi-Key, Wattage=1/16W
R1R R6R R7R: library part RESISTOR_1K_0402, "RES 1k OHM 1% 1/16W 0402", Digikey Part Numer=CR0603-JW-104ELFTR-ND, Supplier Part Number 1=13-AC0402FR-131KLCT-ND, Tolerance="+/- 1%", Value  (Ohms)=1K, Made By="Robert Pafford", Supplier=Digikey, Supplier 1=Digi-Key, Wattage=1/16W
R2C R3C: library part RESISTOR_60.4_0402, "RES 60.4 OHM 1% 1/16W 0402", Digikey Part Numer=CR0603-JW-104ELFTR-ND, Supplier Part Number 1=13-AC0402FR-0760R4LCT-ND, Tolerance="+/- 1%", Value  (Ohms)=60.4, Made By="Robert Pafford", Supplier=Digikey, Supplier 1=Digi-Key, Wattage=1/16W
R2R R3R: library part RESISTOR_27_0402, "RES 27 OHM 1% 1/16W 0402", Digikey Part Numer=CR0603-JW-104ELFTR-ND, Supplier Part Number 1=YAG5278DKR-ND, Tolerance="+/- 1%", Value  (Ohms)=27, Made By="Robert Pafford", Supplier=Digikey, Supplier 1=Digi-Key, Wattage=1/16W
R3: library part RESISTOR_4.7_0603, "RES 4.7 OHM 5% 1/8W 0603", Digikey Part Numer=CR0603-JW-104ELFTR-ND, Supplier Part Number 1=2019-RK73B1JTTD4R7JCT-ND, Tolerance="+/- 5%", Value  (Ohms)=4.7, Made By="Robert Pafford", Supplier=Digikey, Supplier 1=Digi-Key, Wattage=1/8W
R4 R10 R11 R12 R13: library part RESISTOR_10K_0603, "RES 10k OHM 5% 1/10W 0603", Digikey Part Numer=CR0603-JW-104ELFTR-ND, Supplier Part Number 1=2019-RK73B1JTTD103JCT-ND, Tolerance="+/- 5%", Value  (Ohms)=10K, ComponentLink1Description=Datasheet, ComponentLink1URL=https://www.bourns.com/docs/product-datasheets/CRxxxxx.pdf, Made By="Robert Pafford", Supplier=Digikey, Supplier 1=Digi-Key, Wattage=1/8W
R5: library part RESISTOR_56K_0402, "RES 56k OHM 1% 1/16W 0402", Supplier Part Number 1=YAG3501CT-ND, Tolerance="+/- 1%", Value  (Ohms)=56K, Made By="Robert Pafford", Supplier 1=Digi-Key, Wattage=1/16W
R5C: library part RESISTOR_604_0402, "RES 604 OHM 1% 1/16W 0402", Digikey Part Numer=CR0603-JW-104ELFTR-ND, Supplier Part Number 1=13-AC0402FR-07604RLCT-ND, Tolerance="+/- 1%", Value  (Ohms)=604, Made By="Robert Pafford", Supplier=Digikey, Supplier 1=Digi-Key, Wattage=1/16W
R6 R7 R8 R9 R14: library part RESISTOR_4.7K_0603, "RES 4.7k OHM 5% 1/10W 0603", Digikey Part Numer=CR0603-JW-104ELFTR-ND, Supplier Part Number 1=RMCF0603JT4K70CT-ND, Tolerance="+/- 5%", Value  (Ohms)=4.7K, Made By="Robert Pafford", Supplier=Digikey, Supplier 1=Digi-Key, Wattage=1/10W
R7C R8C: library part RESISTOR_200_0402, "RES 200 OHM 1% 1/16W 0402", Digikey Part Numer=CR0603-JW-104ELFTR-ND, Supplier Part Number 1=YAG3453CT-ND, Tolerance="+/- 1%", Value  (Ohms)=200, Made By="Robert Pafford", Supplier=Digikey, Supplier 1=Digi-Key, Wattage=1/16W
S1: "Glass Body Reed Switch SPST-NO 10 ~ 20AT Operate Range 10W 350mA (AC), 500mA (DC) 140 V Through Hole", Max Current (DC)="500 mA", Max Power=10W, Supplier Part Number 1=HE500-ND, Switching Voltage (DC)=200V, Made By="Robert Pafford", Supplier 1=Digi-Key
SW1C: library part CAS-220TA_CAN_TERM, "GOLD SWITCH FLUSH SLIDE DPDT 100MA 6V", Current Rating="100 mA", Supplier Part Number 1=CAS220JCT-ND, Voltage Rating=6VDC, Contact Finish=Gold, Made By="Robert Pafford", Supplier 1=Digi-Key, Switch Function=DPDT
SW1R SW2R: library part "Tactile Switch SMD", "WS-TASV J-Bend SMT Tact Switch, SPST-NO, 16VDC, 50mA, 260g", Manufacturer="Wurth Elektronik", Operating Temperature Max=85°C, Operating Temperature Min=-40°C, Rated Current=50mA, Rated Voltage=16VDC, Category="Tact Switches", Circuit=SPST-NO, ComponentLink1Description="Website Link", ComponentLink1URL=https://www.we-online.com/redexpert/article/434123025826?ad, ComponentLink2Description="Datasheet Link", ComponentLink2URL=https://www.we-online.com/redexpert/spec/434123025826?ad, Contact Material="Stainless Steel", Contact Plating=Silver, Height=2.5mm, Length=4.2mm, Manufacturer Part Number=434123025826, Match Code=WS-TASV, Mount="Surface Mount", Operation Force=260g, Packaging="Tape and Reel", Terminal Material="Copper Alloy", Terminal Plating=Silver, Washable=No, Width=3.2mm
U1: library part TS30041-M050QFNR, "Buck Switching Regulator IC Positive Fixed 5V 1 Output 1A 16-VFQFN Exposed Pad", Max Current=1A, Max Input Voltage=40V, Output Voltage="5V (Fixed)", Supplier Part Number 1=TS30041-M050QFNRCT-ND, Made By="Robert Pafford", Supplier 1=Digi-Key
U1C: "CANbus Controller CAN 2.0 SPI Interface 14-SOIC", Made By="Robert Pafford", Max FD Rate="8 Mbps"
U1R: "Raspberry Pi RP2040", Crystal Frequency="12 MHz", Input Voltage=3.3V, Available Busses="SPI, I2C, PWM, USB", ComponentLink1Description=DigiKey, ComponentLink2Description=Datasheet, ComponentLink2URL=https://datasheets.raspberrypi.org/rp2040/rp2040-datasheet.pdf, Made By="Robert Pafford", Number of GPIOs=29
U2: library part XC9236A33DMR-G, "Buck Switching Regulator IC Positive Fixed 3.3V 1 Output 600mA SOT25", Max Current="600 mA", Max Input Voltage=6V, Output Voltage="3.3V (Fixed)", Supplier Part Number 1=893-1162-1-ND, Made By="Robert Pafford", Supplier 1=Digi-Key
U2C: library part TJA1442AT, "CAN Interface IC High-Speed CAN Transceiver with Standby Mode", Supplier Part Number 1=771-TJA1442AT/0Z, Made By="Robert Pafford", Max Data Rate=5Mbps, Supplier 1=Mouser
U2R: "IC FLASH 128MBIT SPI/QUAD 8SOIC", Supplier Part Number 1=W25Q128JVSIQ-ND, Made By="Robert Pafford", Size=128M, Supplier 1=Digi-Key
U3: library part SHT41-AD1B-R2, "Digital Relative Humidity Temperature Sensor, Â±1.8 / max 2.5 %RH, Â±0.2 Â°C, Ultra-Low-Power", Package=None, Supplier Part Number 1=1649-SHT41-AD1B-R2CT-ND, Availability="In Stock", Check_prices=https://www.snapeda.com/parts/SHT41-AD1B-R2/Sensirion/view-part/?ref=eda, MF=Sensirion, MP=SHT41-AD1B-R2, Price=None, Purchase-URL=https://pricing.snapeda.com/search/part/SHT41-AD1B-R2/?ref=eda, SnapEDA_Link=https://www.snapeda.com/parts/SHT41-AD1B-R2/Sensirion/view-part/?ref=snap, Supplier 1=Digi-Key
Y1R: library part CRYSTAL_12MHz_SMD_SMALL, "12 MHz ±20ppm Crystal 18pF 100 Ohms 4-SMD, No Lead (3.2x2.5mm)", Frequency="12 MHz", Load Capacitance=18pF, Supplier Part Number 1=2151-RH100-12.000-18-2030-EXT-TRCT-ND, ESR="100 Ohms", Made By="Robert Pafford", Supplier 1=Digi-Key

## Free pads (board coordinates)
  round 0 hole 3.162 unplated: ""(4.572,4.572) ""(49.403,4.572)

## Via types
v1: diameter 0.5, hole 0.2, Top Layer to Bottom Layer, tented both sides, 78 vias
v2: diameter 0.8, hole 0.4, Top Layer to Bottom Layer, tented both sides, 31 vias
v3: diameter 0.55, hole 0.25, Top Layer to Bottom Layer, tented both sides, 2 vias
v4: diameter 0.6, hole 0.3, Top Layer to Bottom Layer, tented both sides, 2 vias

## Nets (pads, with @x,y where several pads share a name; then routed paths per layer and width w, separated by ;. In a path a pad name is that pad's centre, name@x,y a point inside that pad or via, vN(x,y) a via of type N, cw(c..) or ccw(c..) an arc to the next point about the centre after c; other vN are vias at no path point)
1v1_RP2040: C11R.1 C12R.1 C13R.1 U1R.23 U1R.45 U1R.50 | length 14.7
  Top Layer w0.2: U1R.50 20.25,36.132 20.319,36.2 v1(20.4,36.2) 20.4,36.281 20.55,36.431 20.55,38.182 v1(20.5,38.232) ; U1R.45 19.85,38.132 19.95,38.232 v1(20.5,38.232) ; U1R.23 v1(24.9,36.932) 24.871,36.961 24.871,37.661 24.3,38.232 v1(20.5,38.232)
  Bottom Layer w0.4: C11R.1 v1(20.5,38.232) ; C13R.1 20.3,36.073 20.4,36.173 v1(20.4,36.2) ; v1(24.9,36.932) 25.3,37.332 C12R.1
3V3: C1C.1 C3C.1 C3R.1 C4.1 C4R.1 C5C.1 C5R.1 C6R.1 C7.1 C7R.1 C8R.1 C9R.1 C10R.1 D1C.4 J1R.2 L2.1 R1C.1 R4C.1 R4R.1 R5R.1 R6.1 R7.1 R8.1 R9.1 U1C.14 U1R.1 U1R.10 U1R.22 U1R.33 U1R.42 U1R.43 U1R.44 U1R.48 U1R.49 U2.4 U2C.5 U2R.8 U3.3 | length 40.8
  Top Layer w0.2: U3.3 14.448,23.513 C7.1@14.5,23.565 ; C7.1 C7.1@14.517,23.483 ; v1@15.382,23.483 v1(15.4,23.5) ; v1(16.7,22.6) R9.1 ; C4R.1 17.7,39.232 18.4,38.532 19.8,38.532 20.081,38.813 v1(20.081,38.882) ; R5R.1 v1(19,29.8) ; v1@18.538,39.393 18.538,39.118 18.725,38.932 U1R.43 ; v1(18.9,22.6) R8.1 ; U1R.49 17.865,36.532 17.796,36.6 17.7,36.6 18.032,36.932 U1R.48 ; v1(19.543,32.2) 19.9,32.557 U1R.1 ; v1(19.635,40.797) 19.9,40.532 U1R.42 ; U1R.10 23.5,33.55 23.7,33.75 v1(23.7,33.832) ; v1(23.5,38.932) U1R.33 ; v1(24.4,22.6) R7.1 ; R6.1 26.649,23.6 v1(27.8,23.6) ; R1C.1 R4C.1 ; C1C.1@35.687,48.954 C1C.1 ; R4R.1 38.975,42.957 38.975,43.707 v1(39,43.732)
  Top Layer w0.203: v1(25,36.112) 25.418,36.53 25.936,36.53 U1R.22
  Top Layer w0.25: C7.1@14.517,23.483 v1@15.382,23.483 ; D1C.4@35.4,20.215 D1C.4@35.408,20.223
  Top Layer w0.3: J1R.2 42.028,38.555 42.028,39.26 42.255,39.486 42.255,40.786 v2(42.3,40.832)
  Top Layer w0.4: U2R.8 C3R.1 ; C4R.1 17.747,39.65 18.282,39.65 v1(18.5,39.432) ; C7R.1 19.451,32.135 19.516,32.2 v1(19.543,32.2) ; v1(19.635,40.797) C10R.1 ; U1C.14@33.237,48.954 33.288,48.903 34.528,48.903 v2(34.6,48.832) 34.708,48.832 34.831,48.954 C1C.1@35.687,48.954 ; D1C.4@35.408,20.223 C5C.1@36.739,20.223 ; C5C.1 37.727,20.23 37.892,20.065 v2(38,20.065) ; C3C.1 45.082,43.549 45.082,44.414 45.162,44.494 45.162,45.364 U2C.5
  Bottom Layer w0.4: v1(17.708,36.608) 17.735,36.608 17.827,36.7 C5R.1 ; C6R.1@22.935,33.732 22.935,33.752 23.015,33.832 v1(23.7,33.832) ; v1(23.5,38.932) C9R.1 ; v1(25,36.112) 25,36.109 25.281,35.829 C8R.1
  other v1: 35.3,44.299 21.6,45.3 22.4,45.3 23.2,45.3 21.2,45.8 22,45.8 22.8,45.8 23.6,45.8
  other v2: 11.8,38.132 45.1,44.432
5V: C2.1 C4C.1 C5.1 C6.1 DS1.2 J2.1 L1.1 U1.5 U2.1 U2.3 U2C.3 | length 92.2
  Top Layer w0.25: U1.5 3.25,23.45 3.7,23 8.6,23
  Top Layer w0.3: J2.1 v2(9.7,48.7)
  Top Layer w0.4: L1.1 4.55,35 8.6,30.95 8.6,23 8.6,16.691 8.59,16.681 8.59,13.139 8.6,13.129 8.6,12.3 DS1.2 ; U2.3 17.15,47.5 17.65,47.5 18,47.85 18,48.8 17.6,49.2 17.15,49.2 U2.1 ; C4C.1 37.58,47.017 37.6,47.017 37.908,46.708 38.323,46.708 v2(38.4,46.632) 38.432,46.664 39.742,46.664 U2C.3
  Top Layer w0.5: C5.1@4.31,40.06 v2@8.55,44.3 ; v2(9.7,48.7) 10.714,49.714 C2.1
  Top Layer w0.6: C5.1@4.2,39.69 C5.1 C5.1@4.31,40.06 ; v2@8.55,44.3 v2(8.6,44.3)
  Bottom Layer w0.3: v2(8.6,44.3) 10.2,42.7 24.4,42.7 27.2,45.5 37.268,45.5 v2(38.4,46.632)
  Bottom Layer w0.5: v2(8.6,44.3) 9.7,45.4 v2(9.7,48.7)
BMS_SCL: J1.3 R6.2 U1R.9 | length 31.3
  Top Layer w0.2: U1R.9 23.1,28.787 26.537,25.351 R6.2 27.949,25.351 31.9,21.4 31.9,16.4 25.7,10.2 J1.3
BMS_SDA: J1.4 R7.2 U1R.8 | length 42.2
  Top Layer w0.2: U1R.8 22.7,26.987 24.336,25.351 R7.2 24.463,25.351 25.6,24.214 25.6,22.822 26.022,22.4 30.3,22.4 31.5,21.2 31.5,17.1 24.4,10 23,10 22.1,9.1 22.1,6.2 23.1,5.2 24.3,5.2 J1.4
BMS_WAKE: J1.5 R13.1 U1R.11 | length 30.2
  Top Layer w0.2: U1R.11 23.9,29.1 26.3,26.7 27.2,26.7 32.3,21.6 32.3,15.2 27.949,10.849 R13.1 27.949,8.849 J1.5
CANCLK_RP2CAN: U1C.6 U1R.32 | length 5.5
  Top Layer w0.2: U1R.32 23.9,40.604 25.888,42.592 U1C.6
CANH: J1.2 SW1C.4 U2C.7 | length 73.7
  Top Layer w0.2: U2C.7@44.8,47.967 U2C.7 46.25,47.967 50.65,43.567 50.65,43.482 51.05,43.082 51.65,43.082 52.7,42.032 52.7,38.6 v1(52.3,38.2)
  Bottom Layer w0.2: J1.2@23.35,6.25 J1.2@23.7,5.9 ; J1.2 22.65,7.65 22.65,9.45 24.8,11.6 49.3,11.6 52.5,14.8 52.5,37.55 52.357,37.693 52.357,38.143 v1(52.3,38.2)
CANL: J1.1 SW1C.1 U2C.6 | length 68.9
  Top Layer w0.2: SW1C.1 47.95,43.082 49.1,41.932 v1(49.1,41.9)
  Top Layer w0.203: U2C.6@44.8,46.697 U2C.6 45.65,46.697 47.65,44.697 SW1C.1
  Bottom Layer w0.2: J1.1@23.7,7.9 J1.1@24.05,8.25 ; J1.1 26.3,11.2 49.5,11.2 52.9,14.6 52.9,39.2 50.2,41.9 v1(49.1,41.9)
CANRX_RP2CAN: U1C.2 U2C.4 | length 21.5
  Top Layer w0.2: U1C.2 27.35,47.672 26.75,48.272 26.75,49.19 27.506,49.947 40.339,49.947 40.8,49.485 40.8,46.027 40.2,45.427 U2C.4
CANTX_RP2CAN: U1C.1 U2C.1 | length 12.4
  Top Layer w0.2: U1C.1 31.951,48.942 32.556,49.547 36.865,49.547 37.175,49.237 U2C.1
DBG_TX_RP2040: J1R.5 U1R.27 | length 18.6
  Top Layer w0.2: U1R.27 29.519,38.532 30.319,39.332 33.733,39.332 33.983,39.582 v1(34.1,39.582) ; v1(35.75,37.241) 35.83,37.161 35.83,36.602 37.41,35.021 39.396,35.021 39.824,35.45 40.155,35.45 40.627,35.922 J1R.5
  Bottom Layer w0.2: v1(34.1,39.582) 34.85,39.582 35.75,38.682 v1(35.75,37.241)
GND: C1C.2 C1R.2 C2.2 C2C.1 C2R.2 C3.2 C3C.2 C3R.2 C4.2 C4C.2 C4R.2 C5.2 C5C.2 C5R.2 C6.2 C6R.2 C7.2 C7R.2 C8.2 C8R.2 C9R.2 C10R.2 C11R.2 C12R.2 C13R.2 DS1.1 J1.6 J1R.6 J2.5 J2.6 J2.7 J2.8 J2.9 Q2.2 Q3.2 Q4.2 R1.1 R2.1 R3.1 R6C.2 R10.2 R11.2 R12.2 R13.2 R14.2 SW1C.6 SW1R.B1 SW1R.B2 SW2R.B1 SW2R.B2 U1.4 U1.14 U1.15 U1.17 U1C.7 U1R.19 U1R.57 U2.2 U2C.2 U2R.4 U3.4 Y1R.2 Y1R.4 | length 76.4
  Top Layer w0.2: v2(23.6,35.232) U1R.57@23.7,35.332 ; U1R.19 28.3,35.332 v1(28.7,34.932) ; R13.2 30.569,10.8 30.719,10.65 v1(30.8,10.65) ; SW2R.B1 v1(36.025,30.732) ; SW2R.B2 v1(40.175,30.732) ; v1(41.1,51.6) 41.117,51.583 41.982,51.583 C8.2 ; SW1R.B1@42.022,29.877 42.025,29.88 v1(42.025,30.732) ; R11.2 42.152,21.802 Q3.2 v1(42.152,24.8) ; SW1R.B2 v1(46.175,30.732) ; R12.2 46.552,21.802 Q4.2 46.576,23.682 46.576,24.776 v1(46.6,24.8) ; R12.2@46.551,21.7 R12.2@46.6,21.749 ; v1(47.9,48.232) 47.9,48.287 48.175,48.562 R6C.2 ; v1(48.367,34.297) C2C.1 ; v1(51,24.8) 50.976,24.776 50.976,23.682 Q2.2 R10.2@50.952,21.802 ; v1(51.3,38.532) 51.3,39.532 SW1C.6 ; R10.2@50.952,21.802 R10.2 R10.2@50.952,21.802
  Top Layer w0.203: Y1R.4 30.722,34.482 31.574,35.333 33.913,35.333 34.68,34.567 C1R.2 34.72,34.567 v1@35.485,35.332 ; Y1R.2 32.767,36.097 C2R.2 34.72,36.097 v1@35.485,35.332 ; v1(35.5,35.332) v1@35.485,35.332 ; SW1R.B1@42.022,29.877 SW1R.B1@42.09,29.809
  Top Layer w0.25: U1.4 3.25,24.55 v1(3.5,24.8) ; v1(3.5,25.8) 3.535,25.8 3.75,26.015 U1.15 ; U1.14 4.25,26.015 4.465,25.8 v1(4.5,25.8) ; U3.4 14.378,24.313 C7.2@14.5,24.435 ; C7.2 14.517,24.318 15.382,24.318 v1(15.4,24.3)
  Top Layer w0.3: J2.5 v2(6.7,46.1) ; v2(16.7,7.9) R14.2 ; v2(17.949,15.651) R1.1 ; v2(22.649,15.651) R2.1 ; v2(27.349,15.651) R3.1 ; v2(41.302,33.723) 41.302,35.289 J1R.6
  Top Layer w0.4: v2(2.2,45.4) J2.8 2.285,43.6 2.985,44.3 J2.7 ; v2(2.2,49.5) J2.9 2.285,51.2 2.985,50.5 J2.6 ; C3R.2@12.735,38.932 13.37,38.932 v2(13.57,39.132) ; v2(15.6,31.232) 15.603,31.229 15.603,29.683 U2R.4 ; C4R.2 17.72,40.567 17.8,40.647 17.8,41.004 18,41.204 v4(18,41.232) 18.027,41.232 C10R.2@18.78,41.985 ; C7R.2 18.018,31.283 18.683,31.283 v1(18.7,31.3) ; U1C.7 28.863,41.322 v2(29.487,41.945) ; v2(35.7,47.132) C1C.2 ; C5C.2 37.727,21.1 37.892,21.265 v2(38,21.265) ; C4C.2 37.533,47.999 38.368,47.999 v2(38.4,48.032) 38.432,47.999 39.743,47.999 U2C.2 ; C3C.2 45.935,43.552 46.015,43.632 46.015,44.038 46.3,44.323 v2(46.3,44.432)
  Top Layer w0.5: C2.2@15.082,47.918 C2.2 ; v2(17.1,45.5) C4.2
  Bottom Layer w0.4: v1(17.589,38.52) 17.589,38.493 17.727,38.355 17.727,38.232 C11R.2 ; C5R.2 19.435,36.72 19.515,36.8 19.535,36.8 19.981,37.246 19.981,37.412 v1(20,37.432) ; v1(19.948,33.779) 19.967,33.799 19.967,34.084 20.28,34.397 C13R.2 ; v4(20.995,33.822) 21,33.827 22.06,33.827 C6R.2 ; v1(22.5,38.919) 22.5,38.946 22.55,38.996 22.55,39.652 C9R.2 ; C8R.2 26.935,36.638 26.9,36.673 v1(26.9,36.7) 26.918,36.718 26.918,37.314 C12R.2
  other v1: 7.5,21.2 7.1,21.7 7.5,22.2 4.5,24.8 8,37.1 7.6,37.6 8,38.1 7.6,38.6 8,39.1 7.6,39.6 8,40.1
  other v2: 21.4,35.232 21.4,37.432 23.6,37.432 13.8,47.936
INT_RP2CAN: U1C.4 U1R.34 | length 7.5
  Top Layer w0.2: U1R.34@23.1,39.832 23.1,40.99 27.242,45.132 U1C.4
LED_G: D3.1 U1R.6 | length 15.9
  Top Layer w0.2: U1R.6 21.9,23.7 24,21.6 26.211,21.6 D3.1
LED_R: D1.1 U1R.4 | length 13.7
  Top Layer w0.2: D1.1 21.1,23.689 U1R.4
LED_Y: D2.1 U1R.5 | length 12.9
  Top Layer w0.2: U1R.5 21.5,21.611 D2.1
LEDB_RP2CAN: R8C.1 U1R.18 | length 4.3
  Top Layer w0.2: U1R.18 26.772,34.932 27.825,33.879 R8C.1
LEDG_RP2CAN: R7C.1 U1R.17 | length 5.4
  Top Layer w0.2: U1R.17 26.606,34.532 27.25,33.888 27.25,31.007 27.825,30.432 R7C.1
LEDR_RP2CAN: R5C.1 U1R.16 | length 6.5
  Top Layer w0.2: U1R.16 26.441,34.132 26.85,33.722 26.85,29.807 27.825,28.832 R5C.1
MISO_RP2CAN: U1C.12 U1R.31 | length 12.1
  Top Layer w0.2: U1R.31 24.3,40.438 25.784,41.922 28.428,41.922 32.908,46.402 U1C.12
MOSI_RP2CAN: U1C.11 U1R.30 | length 11.5
  Top Layer w0.2: U1R.30 24.7,40.272 25.149,40.722 29.253,40.722 30.3,41.768 30.3,42.632 32.8,45.132 U1C.11
nCS_RP2CAN: R4C.2 U1C.13 U1R.28 | length 16.4
  Top Layer w0.2: v1(25.9,39.672) 25.9,38.932 U1R.28 ; v1(26.33,43.301) 26.37,43.262 28.83,43.262 31.093,45.525 31.093,45.965 32.8,47.672 U1C.13 33.65,47.672 35.025,46.297 35.025,46.182 35.2,46.007 R4C.2
  Bottom Layer w0.2: v1(25.9,39.672) 25.9,42.812 26.33,43.243 v1(26.33,43.301)
NetC1_1: C1.1 U1.10 | length 1.8
  Top Layer w0.2: U1.10 5.46,25.04 5.946,25.04 6.062,24.925 6.96,24.925 C1.1
NetC1_2: C1.2 L1.2 U1.1 U1.12 U1.13 U1.16 | length 1.7
  Top Layer w0.2: U1.12 5.46,26.06 6.046,26.06 6.062,26.075 6.96,26.075 C1.2
NetC2C_2: C2C.2 R2C.2 R3C.2 | length 3.7
  Top Layer w0.2: R2C.2 48.7,35.947 49.48,35.167 C2C.2 49.52,35.167 50.3,35.947 R3C.2
NetC2R_1: C2R.1 R1R.2 Y1R.3 | length 6.7
  Top Layer w0.203: R1R.2 30.554,36.532 Y1R.3 30.722,36.514 31.574,37.365 34.281,37.365 34.68,36.967 C2R.1
NetD1_2: D1.2 R1.2 | length 3.4
  Top Layer w0.3: R1.2@19.67,17.119 D1.2@19.67,20.481
  Top Layer w0.4: R1.2 R1.2@19.67,17.119 ; D1.2@19.67,20.481 D1.2
NetD1C_1: D1C.1 R5C.2 | length 11.8
  Top Layer w0.2: R5C.2 30.668,28.732 33.1,26.3 33.1,20.796 33.471,20.425 33.625,20.425 D1C.1
NetD1C_2: D1C.2 R7C.2 | length 11.8
  Top Layer w0.2: R7C.2 29.668,30.332 33.8,26.2 D1C.2
NetD1C_3: D1C.3 R8C.2 | length 13.7
  Top Layer w0.203: R8C.2 28.775,31.832 34.5,26.107 34.5,21.8 34.977,21.323 35.227,21.323 D1C.3
NetD2_2: D2.2 R2.2 | length 3.4
  Top Layer w0.3: R2.2 24.389,17.138 D2.2
NetD3_2: D3.2 R3.2 | length 3.4
  Top Layer w0.3: R3.2 29.089,17.138 D3.2
NetD4_2: D4.2 R14.1 | length 2.4
  Top Layer w0.3: R14.1 19.889,7.862 D4.2
NetL2_2: L2.2 U2.5
NetQ1_1: Q1.1 Q2.3 Q3.3 Q4.3 R4.2 | length 63
  Top Layer w0.2: Q1.1 R4.2@14.665,2.748 ; R4.2@14.603,2.746 R4.2 33.749,2.849 52.241,21.341 52.241,24.794 51.294,25.741 Q2.3 Q4.3 Q3.3
NetR2C_1: R2C.1 SW1C.2 | length 4.4
  Top Layer w0.2: SW1C.2 47.95,41.332 48.75,40.532 48.75,37.657 R2C.1
NetR3C_1: R3C.1 SW1C.5 | length 4.4
  Top Layer w0.2: R3C.1 50.25,37.657 50.25,40.532 51.05,41.332 SW1C.5
NetR5_1: R5.1 S1.1 | length 2.3
  Top Layer w0.2: S1.1 R5.1
NetR6C_1: R6C.1 U2C.8 | length 2
  Top Layer w0.2: U2C.8 R6C.1
NetR6R_1: R6R.1 SW1R.A2 | length 2.3
  Top Layer w0.2: SW1R.A2 46.275,31.932 46.5,32.157 R6R.1
NetR7R_1: R7R.1 SW2R.A1 | length 3.8
  Top Layer w0.2: R7R.1 SW2R.A1
NetU1R_7: U1R.7
NetU1R_14: U1R.14
NetU1R_15: U1R.15
NetU1R_35: U1R.35
NetU1R_36: U1R.36
NetU1R_37: U1R.37
NetU1R_38: U1R.38
NetU1R_39: U1R.39
NetU1R_40: U1R.40
NetU1R_41: U1R.41
PACK_PWR: J1.7 Q4.1 R12.1 | length 26.4
  Top Layer w0.2: J1.7@30.015,8.6 38.9,8.6 44.749,14.449 R12.1 44.647,21.802 Q4.1
PERIPH_SCL: DS1.3 R8.2 U1R.3 U3.2 | length 31
  Top Layer w0.2: DS1.3 10.91,14.75 10.91,17.19 9.6,18.5 9.6,22.4 10.713,23.513 U3.2 13.513,21.9 17.183,21.9 17.7,22.417 17.7,24.214 18.837,25.351 R8.2 18.9,27 20.7,28.8 U1R.3
PERIPH_SDA: DS1.4 R9.2 U1R.2 U3.1 | length 24.8
  Top Layer w0.2: DS1.4 9.8,16.384 9.2,16.984 9.2,23.242 10.27,24.313 U3.1 12.938,25.351 16.763,25.351 17.171,25.759 17.171,25.822 20.3,28.951 U1R.2
PWR_CTRL: Q3.1 R11.1 U1R.12 | length 24.5
  Top Layer w0.2: U1R.12 24.3,29.6 v1(26,27.9) ; v1(40.3,24.8) 40.274,24.774 40.274,23.685 Q3.1 40.247,21.802 R11.1 R11.1@40.4,21.649
  Bottom Layer w0.2: v1(26,27.9) 26.6,27.3 37.8,27.3 v1(40.3,24.8)
QSPI_SCLK_RP2040: U1R.52 U2R.6 | length 7.2
  Top Layer w0.2: U2R.6@14.335,36.882 14.335,37.432 14.935,38.032 15.698,38.032 16.6,37.129 16.6,36.202 17.47,35.332 U1R.52
QSPI_SD0_RP2040: U1R.53 U2R.5 | length 4.5
  Top Layer w0.2: U2R.5@15.605,36.882 15.605,36.427 17.1,34.932 U1R.53
QSPI_SD1_RP2040: U1R.55 U2R.2 | length 11.1
  Top Layer w0.2: U2R.2@13.065,29.782 13.065,29.232 13.765,28.532 14.085,28.532 14.086,28.53 15.854,28.53 16.5,29.177 16.5,32.432 18.2,34.132 U1R.55
QSPI_SD2_RP2040: U1R.54 U2R.3 | length 7.9
  Top Layer w0.2: U2R.3@14.335,29.782 14.335,31.767 17.1,34.532 U1R.54
QSPI_SD3_RP2040: U1R.51 U2R.7 | length 8.5
  Top Layer w0.2: U2R.7@13.065,36.882 13.065,37.432 14.065,38.432 15.8,38.432 17.1,37.132 17.1,36.437 17.806,35.732 U1R.51
QSPI_SS_RP2040: R5R.2 R7R.2 U1R.56 U2R.1 | length 29.4
  Top Layer w0.2: U2R.1@11.795,29.782 U2R.1 11.795,29.232 12.995,28.032 v1@16.1,28.032 ; v1(16.1,27.932) 17.3,29.132 17.3,29.9 17.3,32.5 18.532,33.732 U1R.56 ; v1(30,31.932) R7R.2
  Bottom Layer w0.2: v1@16.1,28.032 18.832,28.032 22.732,31.932 v1(30,31.932)
RUN_RP2040: J1R.4 R4R.2 R6R.2 U1R.26 | length 32.4
  Top Layer w0.2: U1R.26 29.684,38.132 30.484,38.932 34.419,38.932 37.219,41.732 v1(39.9,41.732) R4R.2 ; J1R.4 42.94,38.196 44.476,38.196 ; v1(44.266,41.732) 44.3,41.732 45.375,40.656 45.375,39.096 44.476,38.196 ; R6R.2 46.5,36.172 44.476,38.196
  Bottom Layer w0.2: v1(39.9,41.732) v1(44.266,41.732)
SCK_RP2CAN: U1C.10 U1R.29 | length 10.2
  Top Layer w0.2: U1R.29 25.1,40.107 25.315,40.322 29.419,40.322 30.745,41.648 30.745,41.896 32.711,43.862 U1C.10
SWCLK_RP2040: J1R.3 U1R.24 | length 15.4
  Top Layer w0.2: U1R.24 30.016,37.332 30.776,38.092 39.765,38.092 J1R.3
SWDIO_RP2040: J1R.1 U1R.25 | length 18.3
  Top Layer w0.2: U1R.25 29.85,37.732 30.61,38.492 34.557,38.492 37.332,41.267 39.396,41.267 40.295,40.367 40.295,39.607 40.665,39.237 J1R.1
SWITCH_SIGNAL: C8.1 Q2.1 R5.2 R10.1 U1R.13 | length 63.4
  Top Layer w0.2: U1R.13 24.7,30.1 v1(26.9,27.9) ; R5.2 40.11,52.435 C8.1 42.032,52.467 43.767,52.467 v1(43.8,52.5) ; v1(49.1,24.8) 49.074,24.774 49.074,23.685 Q2.1 49.047,21.802 R10.1
  Bottom Layer w0.2: v1(26.9,27.9) 46,27.9 ; v1(43.8,52.5) 43.8,51.2 47.817,47.183 47.817,32.57 47.9,32.487 47.9,29.8 46,27.9 ; v1(49.1,24.8) 46,27.9
TERM_DET_RP2CAN: R1C.2 SW1C.3 U1C.9 | length 15.8
  Top Layer w0.2: U1C.9 R1C.2@35.2,42.592 ; R1C.2 R1C.2@35.2,42.592 ; v1(36.6,42.532) 36.57,42.562 35.23,42.562 R1C.2@35.2,42.592 ; v1(44.862,42.1) 44.862,42.07 47.35,39.582 SW1C.3
  Bottom Layer w0.2: v1(36.6,42.532) 44.372,42.532 44.803,42.1 v1(44.862,42.1)
USB_N: J2.2 R3R.1 | length 12.6
  Top Layer w0.203: J2.2 4.973,47.952 5.719,47.952 5.742,47.928 7.224,47.928 13.779,41.373 14.007,41.373 14.126,41.492 14.126,41.909 R3R.1
USB_P: J2.3 R2R.1 | length 12.6
  Top Layer w0.203: J2.3 4.973,47.498 5.719,47.498 5.742,47.522 7.056,47.522 13.611,40.967 14.007,40.967 14.126,40.848 14.126,40.431 R2R.1
USB_RP2040_N: R3R.2 U1R.46 | length 7
  Top Layer w0.2: R3R.2 15.27,41.914 15.27,41.487 15.387,41.37 15.777,41.37 16.936,40.211 16.936,38.396 17.039,38.293 17.361,37.97 17.6,37.732 U1R.46
USB_RP2040_P: R2R.2 U1R.47 | length 7
  Top Layer w0.2: R2R.2 15.27,40.426 15.27,40.853 15.387,40.97 15.611,40.97 16.536,40.045 16.536,38.23 16.639,38.127 17.195,37.57 17.434,37.332 U1R.47
VBAT: J1.8 Q1.2 R4.1 S1.2 | length 88.9
  Top Layer w0.55: Q1.2 14.398,4.653 R4.1 15.749,4.551 16.3,4 27.1,4 J1.8
  Bottom Layer w0.2: S1.2 11,52.4 5.5,46.9 5.5,32.9 13.5,24.9 13.5,14.7 23.6,4.6 27.7,4.6 J1.8
VCC: C3.1 D4.1 Q1.3 U1.2 U1.3 U1.11 | length 38.6
  Top Layer w0.25: U1.11 6.25,25.55 v3(6.3,25.5)
  Top Layer w0.3: v2(8.975,4.4) 10.075,5.5 D4.1
  Top Layer w0.55: C3.1 2.94,16.66 7.3,12.3 v2(7.3,10.7) ; v2(8.975,4.4) 9.003,4.4 9.703,3.7 Q1.3
  Mid Layer 2 w0.55: v2(7.3,10.7) 7.3,6.075 v2(8.975,4.4)
  Bottom Layer w0.55: v3(1.5,22.8) 5.4,22.8 6.3,23.7 v3(6.3,25.5)
XIN_RP2040: C1R.1 U1R.20 Y1R.1 | length 11.3
  Top Layer w0.2: U1R.20 28.9,35.732 29.7,34.932 29.7,33.679 30.048,33.332 31.65,33.332 32.5,34.182 Y1R.1 33.498,34.332 34.1,33.729 34.668,33.729 C1R.1
XOUT_RP2040: R1R.1 U1R.21 | length 2.1
  Top Layer w0.2: U1R.21 27.498,36.132 27.798,36.432 R1R.1
pads on no net: J1R.A J1R.B J1R.C J1R.D J1R.E J1R.F J1R.G J2.4 SW1R.A1 SW2R.A2 U1.6 U1.7 U1.8 U1.9 U1C.3 U1C.5 U1C.8

## Polygon pours and split planes (outlines as drawn)
VCC on Top Layer "VCC_L01_P020" (solid, pour order 20): 3,25.675 2.275,25.675 1.275,25.675 0.6,25 0.6,21.8 1.61,20.79 3.54,20.79 3.54,22.61 2.34,22.61 1.9,23.05 1.9,24.7 2.125,24.925 3,24.925
3V3 on Top Layer "3V3_L01_P010" (solid, pour order 10): 20.3,47.7 19.3,47.7 19.3,47.092 19.808,46.008 19.808,44.992 20.57,44.992 21.4,44.992 24.15,44.992 24.15,46.7 24.15,47.5 21.45,47.5
5V on Top Layer "5V_L01_P023" (solid, pour order 23): 3.1,34.25 3.1,35.75 3.6,40.55 4.8,40.55 5.3,35.75 5.3,34.25
NetC1_2 on Top Layer "NETC1_2_L01_P022" (solid, pour order 22): 2.3,25.925 2.825,25.925 2.825,26.425 2.875,26.475 3.375,26.475 3.375,27.161 3.826,27.95 3.826,29.4 3.1,29.4 3.1,27.95 2.3,27.15
NetC1_2 on Top Layer "NETC1_2_L01_P021" (solid, pour order 21): 5.725,25.925 5.175,25.925 5.175,26.425 5.125,26.475 4.625,26.475 4.625,29.275 4.6,29.3 4.75,29.45 5.3,29.45 5.3,27.95 5.725,27.525 5.725,26.175
GND on Top Layer "GND_L01_P018" (solid, pour order 18): 5.26,20.79 7.9,20.79 7.9,22.61 5.26,22.61
GND on Top Layer "GND_L01_P017" (solid, pour order 17): 5.71,36.65 5.71,40.55 8.4,40.55 8.4,36.65
GND on Top Layer "GND_L01_P016" (solid, pour order 16): 17.55,48.65 16.55,48.65 15.608,48.317 14.592,48.317 14,48.4 13.2,48.4 13.2,47.472 14,47.472 14.592,47.555 15.608,47.555 16.55,48.05 17.55,48.05
5V on Top Layer "5V_L01_P012" (solid, pour order 12): 14.592,49.333 15.608,49.333 16.55,49 17.55,49 17.55,49.6 16.55,49.6 15.608,50.095 14.592,50.095
NetL2_2 on Top Layer "NETL2_2_L01_P008" (solid, pour order 8): 19.3,49.6 20.3,49.6 21.45,50.1 24.15,50.1 24.15,49.3 21.45,49.3 20.3,49 19.3,49
GND on Mid Layer 1 "GND_L02_P002" (solid, pour order 2): 0,2.54 0,51.8 cw(c2.54,51.8) 2.54,54.34 51.435,54.34 cw(c51.435,51.8) 53.975,51.8 53.975,2.54 cw(c51.435,2.54) 51.435,0 2.54,0 cw(c2.54,2.54)
3V3 on Mid Layer 2 "3V3_L03_P003" (solid, pour order 3): 0,2.54 0,51.8 cw(c2.54,51.8) 2.54,54.34 51.435,54.34 cw(c51.435,51.8) 53.975,51.8 53.975,2.54 cw(c51.435,2.54) 51.435,0 2.54,0 cw(c2.54,2.54)

## Keep-outs
Top Layer:
  region: 45.713,-0.026 53.333,-0.026 53.333,7.594 ccw(c50.793,7.594) 50.793,10.134 48.253,10.134 ccw(c48.253,7.594) 45.728,7.865
  region: 0.755,-0.026 8.375,-0.026 8.375,7.594 ccw(c5.835,7.594) 5.835,10.134 3.295,10.134 ccw(c3.295,7.594) 0.755,7.594
Bottom Layer:
  region: 45.713,-0.026 53.333,-0.026 53.333,7.594 ccw(c50.793,7.594) 50.793,10.134 48.253,10.134 ccw(c48.253,7.594) 45.728,7.865
  region: 0.755,-0.026 8.375,-0.026 8.375,7.594 ccw(c5.835,7.594) 5.835,10.134 3.295,10.134 ccw(c3.295,7.594) 0.755,7.594
Keep-Out Layer:
  the board outline again, w0.127

## Silkscreen, mask and mechanical layers (free items; w line width, h text height)
Top Overlay:
  text "TERM / ON" at 47.511,44.16 h1.02
  text "BOOT" at 36.238,27.789 h1.02
  text "RESET" at 41.73,27.789 h1.02
Bottom Overlay:
  drawing of 30 lines, arcs and shapes, not listed
  text "The Underwater Robotics Team" at 47.394,49.154 h1.52
  text "'.ProjectTitle'" at 47.546,46.662 h1.52
  text "v'.BoardRevision'" at 47.546,44.154 h1.52
  text "PAK+" at 30.691,19.472 h1.02 r90
  text "CANL" at 24.691,19.2 h1.02 r90
  text "SCL" at 26.691,19.2 h1.02 r90
  text "WAKE" at 28.691,19.2 h1.02 r90
  text "CANH" at 24.691,14.7 h1.02 r90
  text "SDA" at 26.691,14.7 h1.02 r90
  text "GND" at 28.691,14.7 h1.02 r90
  text "BAT+" at 30.691,14.7 h1.02 r90
Mechanical 11: